# Allegro board BeagleV-FIRE_REV-A_230911.brd
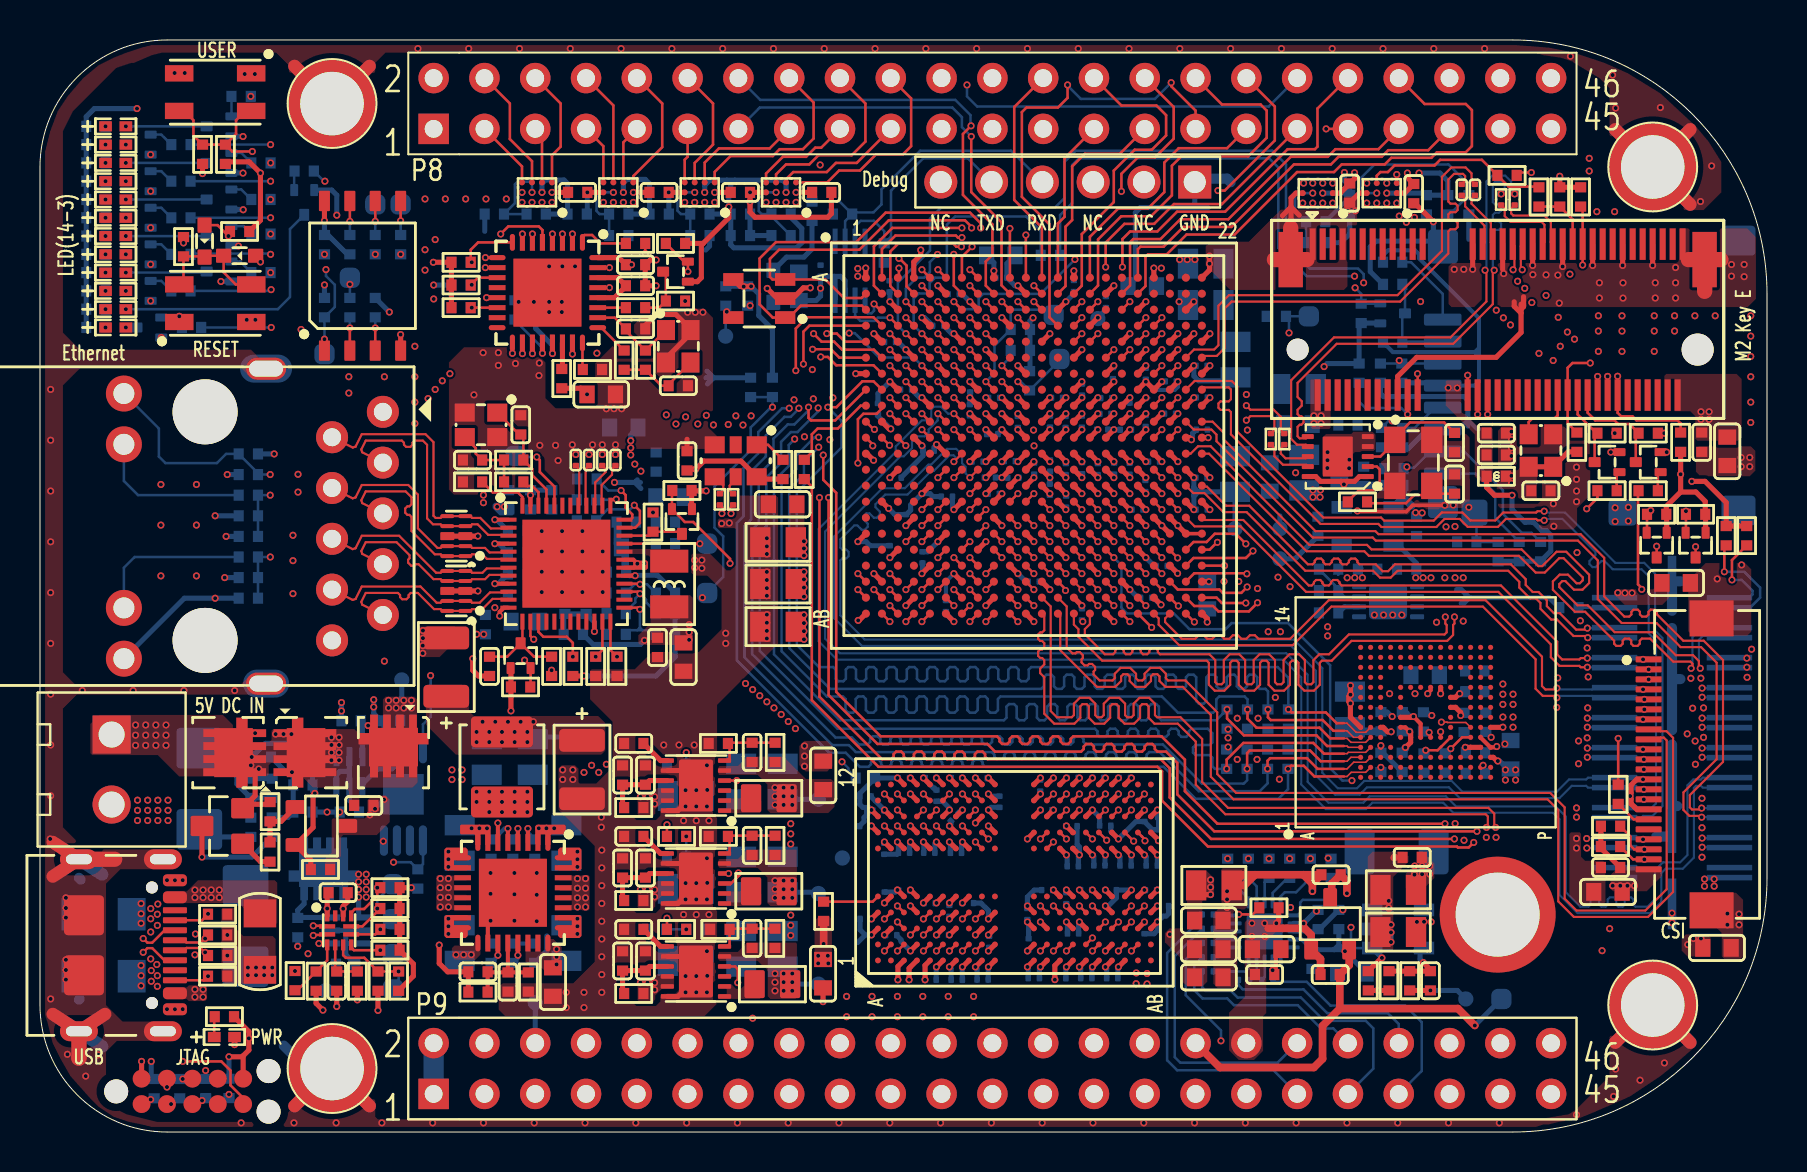
[diagram p0: board, top side]
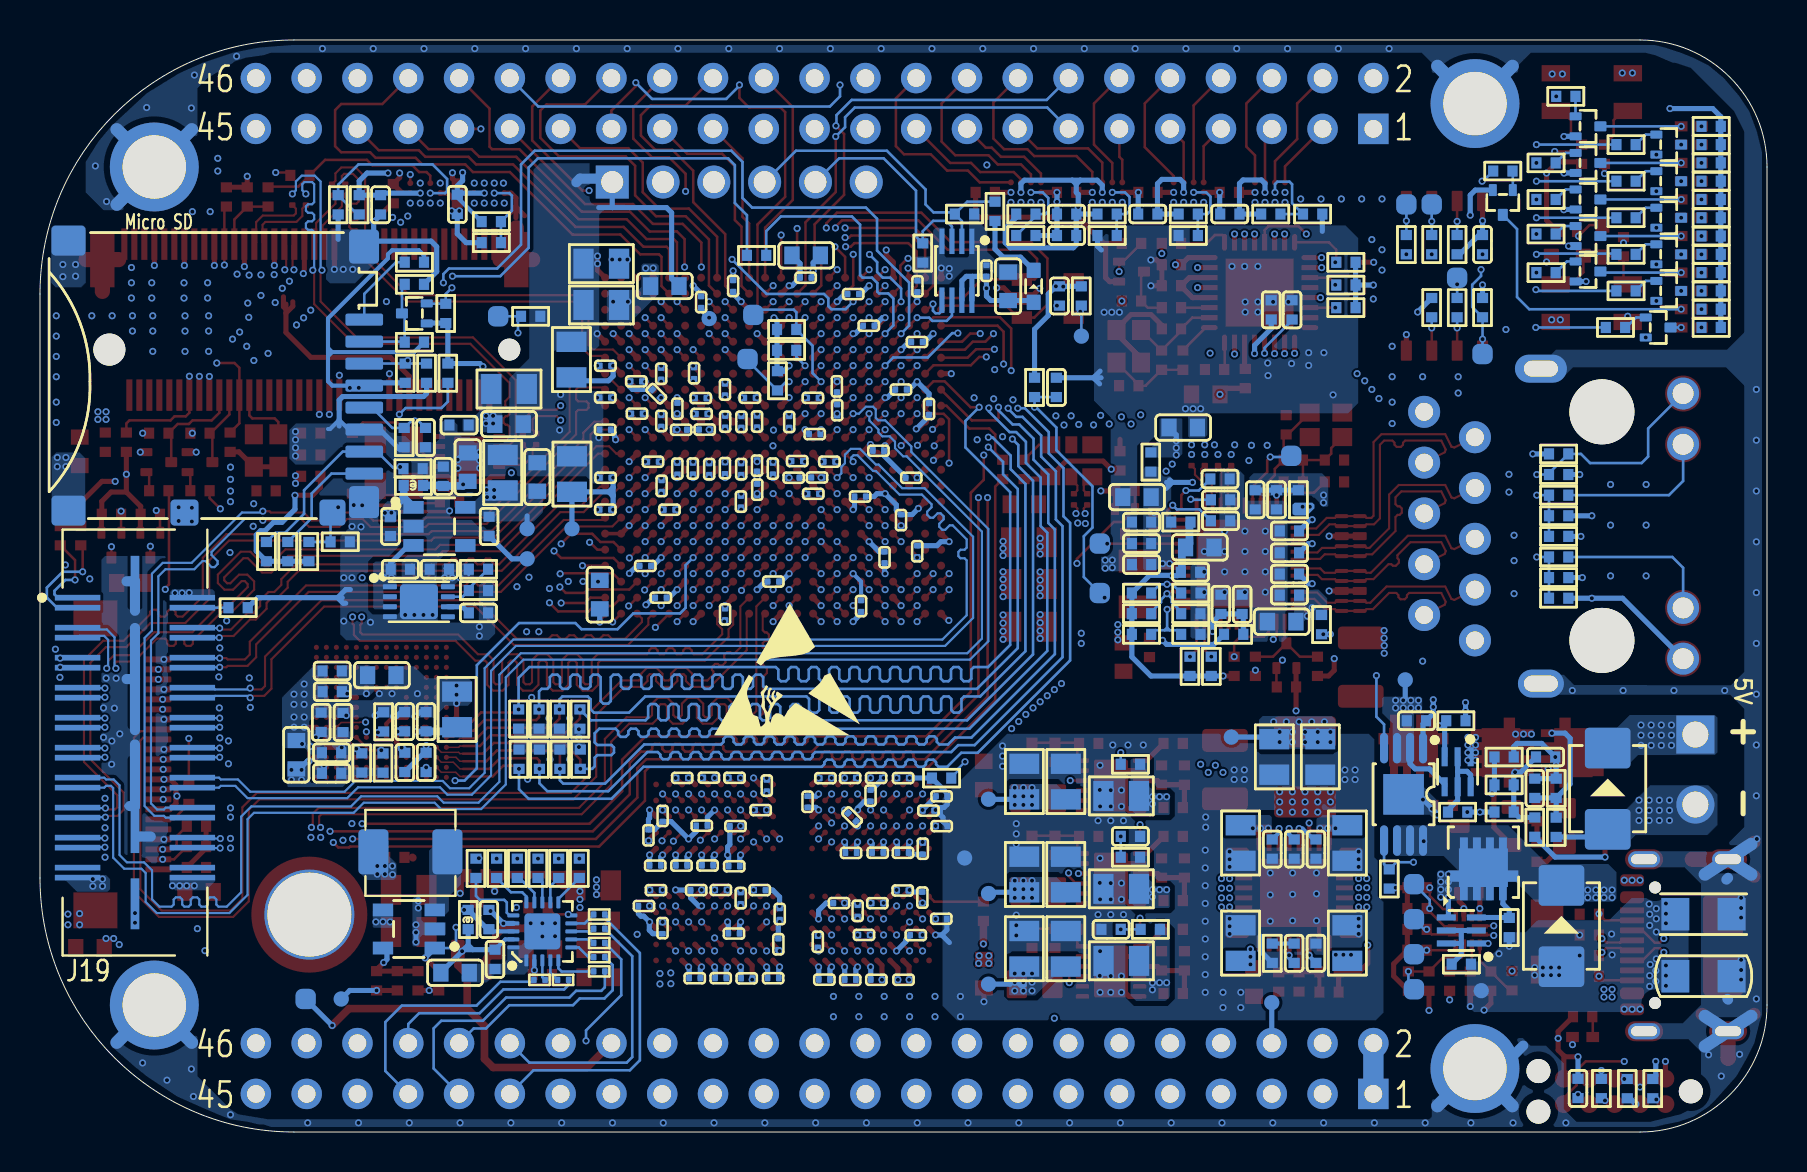
[diagram p1: board, bottom side, seen from below]

Outline 86.36 x 54.61 mm; copper layers: TOP, L2_GND1, L3_SIG1, L4_GND2, L5_SIG2, L6_GND3, L7_PWR1, L8_PWR2, L9_GND4, L10_SIG3, L11_GND5, BOTTOM. Coordinates in mm from the lower left corner of the outline.
Outline path: 0,48.26 0,6.35 arc(1.86,1.86) 6.35,0 73.66,0 arc(82.64,3.72) 86.36,12.7 86.36,41.91 arc(82.64,50.89) 73.66,54.61 6.35,54.61 arc(1.86,52.75) 0,48.26

## Design rules (mm)
constraint set DEFAULT: min track width 0.127
net group ADC_CSN: nets ADC_CSN N8479704
net group ADC_IRON: nets ADC_IRON N8479940
net group ADC_MCLK: nets ADC_MCLK N8479976
net group ADC_SCK_1: nets ADC_SCK_1 N8479744
net group AGND: nets ADC_VREF VDD_ADC
net group B0_HSIO70: nets B0_HSIO70N B0_HSIO70P
net group B0_HSIO71: nets B0_HSIO71N B0_HSIO71P
net group B0_HSIO81: nets B0_HSIO81N B0_HSIO81P
net group B0_HSIO82: nets B0_HSIO82N B0_HSIO82P
net group B0_HSIO83: nets B0_HSIO83N B0_HSIO83P
net group DIFFPAIR2: nets PHY_TDA_N PHY_TDA_P
net group DIFFPAIR3: nets PHY_TDB_N PHY_TDB_P
net group DIFFPAIR4: nets PHY_TDC_N PHY_TDC_P
net group DIFFPAIR5: nets PHY_TDD_N PHY_TDD_P
net group DP1: nets B0_HSIO73N_C2P_CLKN B0_HSIO73P_C2P_CLKP
net group EMMC_CLK: nets EMMC_CLK N10515706
net group H_M2_CLKREQ0N: nets H_M2_CLKREQ0N N8483531
net group JTAT_TDO: nets JTAT_TDO N8350787
net group M2_PER0_P: nets M2_PER0_N M2_PER0_P
net group M2_PET0_N: nets M2_PET0_N N8484033
net group M2_PET0_P: nets M2_PET0_P N8484079
net group M2_REFCLK_N: nets M2_REFCLK_N N8483949
net group M2_REFCLK_P: nets M2_REFCLK_P N8483961
net group M2_W_DISABLE1: nets M2_W_DISABLE1 N8759844
net group M2_W_DISABLE2: nets M2_W_DISABLE2 N8759792
net group MSS_REFCLK_IN_N: nets MSS_REFCLK_IN_N N8366838
net group MSS_REFCLK_IN_P: nets MSS_REFCLK_IN_P N8366836
net group MSS_SGMII_RX0_N: nets MSS_SGMII_RX0_N PHY_SGMII_SON
net group MSS_SGMII_RX0_P: nets MSS_SGMII_RX0_P PHY_SGMII_SOP
net group MSS_SGMII_TX0_N: nets MSS_SGMII_TX0_N PHY_SGMII_SIN
net group MSS_SGMII_TX0_P: nets MSS_SGMII_TX0_P PHY_SGMII_SIP
net group N8655619: nets N8655619 N8656945
net group N10796077: nets N10796077 N10797068
net group P8_PIN3: nets N8547620 P8_PIN3
net group P8_PIN4: nets N8547432 P8_PIN4
net group P8_PIN5: nets N8547443 P8_PIN5
net group P8_PIN6: nets N8547450 P8_PIN6
net group P8_PIN7: nets N8547457 P8_PIN7
net group P8_PIN8: nets N8547464 P8_PIN8
net group P8_PIN9: nets N8547471 P8_PIN9
net group P8_PIN10: nets N8547478 P8_PIN10
net group P8_PIN11: nets N8547485 P8_PIN11
net group P8_PIN12: nets N8547496 P8_PIN12
net group P8_PIN13: nets N8547505 P8_PIN13
net group P8_PIN14: nets N8547512 P8_PIN14
net group PWDN: nets CSI1_PWDN PWDN
net group SGMII_RX1: nets MSS_SGMII_RX1_N MSS_SGMII_RX1_P
net group SGMII_TX1: nets MSS_SGMII_TX1_N MSS_SGMII_TX1_P
net group SPI_MISO: nets N8350930 SPI_MISO
net group SPI_MOSI: nets N8350881 SPI_MOSI
net group SPI_SCK: nets N8350883 SPI_SCK
net group USB0_CLK: nets N8382887 USB0_CLK
net group USB0_DP: nets USB0_DM USB0_DP
net group USB0_VBUS: nets N8393015 USB0_VBUS
net group XCVR_0A_REFCLK_N: nets N8485397 XCVR_0A_REFCLK_N
net group XCVR_0A_REFCLK_P: nets N8485437 XCVR_0A_REFCLK_P
net group XCVR_0B_REFCLK_P: nets XCVR_0B_REFCLK_N XCVR_0B_REFCLK_P
net group XCVR_0C_REFCLK: nets XCVR_0C_REFCLK_N XCVR_0C_REFCLK_P
net group XCVR_RX1: nets XCVR_RX1_N XCVR_RX1_P
net group XCVR_TX1: nets XCVR_TX1_N XCVR_TX1_P
net group ADC_MISO: nets 3V3_SD_CS ADC_MISO ADC_MOSI N8479810 N8479866 SD_3V3 SD_DET
net group AVDD10: nets AVDD10 DVDD10 PHY_VDDIO
net group CAM: nets CAM_C_N CAM_C_P CAM_D0_N CAM_D0_P CAM_D1_N CAM_D1_P CAM_D2_N CAM_D2_P CAM_D3_N CAM_D3_P
net group EMMC: nets EMMC_CMD EMMC_DATA0 EMMC_DATA1 EMMC_DATA2 EMMC_DATA3 EMMC_DATA4 EMMC_DATA5 EMMC_DATA6 EMMC_DATA7 EMMC_DQ EMMC_RSTN
net group LPDDR4_CLASS: nets LPDDR4_CA0 LPDDR4_CA1 LPDDR4_CA2 LPDDR4_CA3 LPDDR4_CA4 LPDDR4_CA5 LPDDR4_CKE0_A LPDDR4_CS0_A LPDDR4_ODT_CA_A LPDDR4_RESETN
net group LPDDR4_CLK: nets LPDDR4_CK_N LPDDR4_CK_P LPDDR4_DQS3_N LPDDR4_DQS3_P
net group PCIE_RX: nets XCVR_RX2_N XCVR_RX2_P XCVR_RX3_N XCVR_RX3_P
net group PCIE_TX: nets XCVR_TX2_N XCVR_TX2_P XCVR_TX3_N XCVR_TX3_P
net group PG_1V0: nets N8667397 N8671822 PG_1V0
net group PHY_DVDD3V3: nets PHY_DVDD_RG
net group PHY_OUT: nets N8364939 PHY_OUT PHY_XI
net group POWER: nets VCC_1V8 VCC_2V5 VCC_3V3
net group USB0: nets USB0_DATA0 USB0_DATA1 USB0_DATA2 USB0_DATA3 USB0_DATA4 USB0_DATA5 USB0_DATA6 USB0_DATA7
net group USB0_XI: nets N8383947 USB0_XI USB0_XO

## Placement (name value [footprint] x y rotation side)
1  VShort  [VIRTUAL_SHORT]  62.25 10.19 180 top
C1  4.7uF  [C0805]  32.29 12.16 0 bottom
C2  100nF  [C0201]  45.75 15.75 45 bottom
C3  100nF  [C0201]  51.32 11.7 90 bottom
C4  100nF  [C0201]  52.32 7.69 0 bottom
C5  100nF  [C0201]  45.47 11.06 90 bottom
C6  100nF  [C0201]  52.91 17.72 0 bottom
C7  100nF  [C0201]  51.58 15.3 0 bottom
C8  100nF  [C0201]  44.54 7.61 180 bottom
C9  100nF  [C0201]  44.55 17.7 180 bottom
C10  100nF  [C0201]  50.02 17.33 270 bottom
C11  100nF  [C0201]  50.32 16.1 0 bottom
C12  100nF  [C0201]  49.7 7.69 0 bottom
C13  100nF  [C0201]  47.09 17.69 180 bottom
C14  100nF  [C0201]  44.47 13.96 180 bottom
C15  100nF  [C0201]  41.93 16.07 180 bottom
C16  100nF  [C0201]  49.44 9.39 270 bottom
C17  100nF  [C0201]  50.37 12.1 180 bottom
C18  100nF  [C0201]  56.16 11.3 0 bottom
C19  100nF  [C0201]  52.98 13.33 0 bottom
C20  100nF  [C0201]  51.63 17.71 0 bottom
C21  100nF  [C0201]  47.14 7.62 180 bottom
C22  100nF  [C0201]  55.93 14.84 90 bottom
C23  100nF  [C0201]  52.31 12.1 0 bottom
C24  100nF  [C0201]  51.65 13.29 0 bottom
C25  100nF  [C0201]  51.02 7.68 0 bottom
C26  100nF  [C0201]  44.83 16.82 90 bottom
C27  33pF  [C0402]  35.61 14.34 90 top
C28  100nF  [C0201]  45.8 13.96 180 bottom
C29  100nF  [C0201]  49.37 10.9 90 bottom
C30  100nF  [C0201]  47.46 9.51 270 bottom
C31  100nF  [C0201]  47.98 16.52 90 bottom
C32  100nF  [C0201]  45.84 7.61 180 bottom
C33  100nF  [C0201]  46.41 11.45 0 bottom
C34  100nF  [C0201]  44.49 11.44 180 bottom
C35  100nF  [C0201]  45.15 9.86 0 bottom
C36  100nF  [C0201]  43.21 13.96 180 bottom
C37  100nF  [C0201]  43.18 7.61 180 bottom
C38  100nF  [C0201]  53.62 7.69 0 bottom
C39  100nF  [C0201]  43.22 12.08 180 bottom
C40  100nF  [C0201]  43.2 17.7 180 bottom
C41  100nF  [C0201]  55.6 13.32 0 bottom
C42  100nF  [C0201]  55.56 12.1 0 bottom
C43  100nF  [C0201]  53.55 12.1 0 bottom
C44  100nF  [C0201]  42.57 9.85 0 bottom
C45  100nF  [C0201]  45.85 17.7 180 bottom
C46  100nF  [C0201]  53.27 15.32 0 bottom
C48  100nF  [C0201]  51.66 9.93 180 bottom
C49  100nF  [C0201]  41.28 16.79 180 bottom
C50  100nF  [C0201]  55.22 15.81 270 bottom
C51  100nF  [C0201]  54.28 13.32 0 bottom
C52  100nF  [C0201]  54.25 17.71 0 bottom
C53  100nF  [C0201]  55.23 10.2 270 bottom
C54  100nF  [C0201]  42.24 11.72 90 bottom
C55  100nF  [C0201]  41.29 10.66 180 bottom
C56  100nF  [C0201]  42.21 14.17 270 bottom
C57  100nF  [C0201]  41.27 15.3 180 bottom
C58  10uF  [C0603]  58.45 10.58 0 top
C59  10uF  [C0603]  39.16 7.92 270 top
C60  10uF  [C0603]  39.16 17.83 90 top
C61  10uF  [C0603]  58.45 9.14 0 top
C62  10uF  [C0603]  58.45 7.74 0 top
C63  100nF  [C0402]  68.13 20.52 90 bottom
C64  100nF  [C0402]  71.75 22.02 0 bottom
C65  100nF  [C0402]  71.75 23.06 0 bottom
C66  100nF  [C0402]  68.12 18.48 270 bottom
C67  100nF  [C0402]  67.06 20.52 90 bottom
C68  100nF  [C0402]  71.78 18.97 0 bottom
C69  100nF  [C0402]  72.3 20.49 90 bottom
C70  100nF  [C0402]  71.78 17.94 0 bottom
C71  100nF  [C0402]  71.21 20.48 90 bottom
C72  4.7uF  [C0603]  69.27 22.85 180 bottom
C73  4.7uF  [C0603]  73.54 18.87 90 bottom
C74  100nF  [C0402]  67.05 18.48 90 bottom
C75  100nF  [C0402]  72.82 34.95 0 top
C77  1uF  [C0402]  72.82 33.86 0 top
C81  100nF  [C0402]  9.45 2.18 270 bottom
C82  100nF  [C0402]  14.23 44.38 270 bottom
C83  1nF  [C1206]  3.18 7.79 180 bottom
C85  100nF  [C0201]  28.78 33.6 270 top
C86  100nF  [C0201]  28.12 33.6 270 top
C87  100nF  [C0201]  27.45 33.6 270 top
C88  100nF  [C0201]  26.79 33.6 270 top
C90  100nF  [C0402]  31.28 29.43 0 bottom
C91  1nF  [C0402]  31.28 30.5 0 bottom
C92  1uF  [C0402]  27.31 26.39 90 bottom
C93  100nF  [C0402]  26.25 26.39 90 bottom
C95  27pF  [C0402]  24.04 35.36 90 top
C96  27pF  [C0402]  21.63 33.6 180 top
C98  100nF  [C0402]  32.36 33.57 90 top
C99  1uF  [C0402]  24.53 31.62 270 bottom
C104  18pF  [C0402]  29.78 40.17 0 top
C105  18pF  [C0402]  31.92 37.32 0 top
C106  100nF  [C0402]  14.84 7.55 270 top
C107  100nF  [C0402]  14.91 11.97 0 top
C108  100uF  [C1206]  11 9.52 270 top
C109  100nF  [C0402]  17.53 20.57 180 bottom
C110  1uF  [C0402]  29.78 42.32 0 top
C111  1uF  [C0402]  23.75 41.11 90 bottom
C112  100nF  [C0402]  29.78 43.37 0 top
C113  22uF  [C0805]  37.14 12.88 90 bottom
C114  100nF  [C0402]  24.79 41.11 90 bottom
C115  2.2uF  [C0603]  28.07 36.89 0 top
C116  22uF  [C0805]  26.32 14.45 270 bottom
C117  100nF  [C0402]  61.24 7.88 180 top
C119  10uF  [C0603]  61.34 9.14 180 top
C120  100nF  [C0402]  64.56 12.87 180 top
C121  100nF  [C0402]  64.52 7.88 180 top
C127  100nF  [C0402]  63.91 10.62 90 bottom
C128  100nF  [C0402]  83.1 34.5 270 top
C129  10uF  [C0603]  84.37 34.04 270 top
C132  100nF  [C0201]  71.75 47.12 90 top
C133  100nF  [C0201]  71.09 47.12 90 top
C134  100nF  [C0402]  65.41 35.35 0 bottom
C135  10uF  [C0603]  62.91 35.4 180 bottom
C136  100nF  [C0402]  75.05 32.07 0 top
C138  100nF  [C0402]  63.61 8.64 270 bottom
C139  10uF  [C0603]  65.6 7.97 180 bottom
C140  2.2nF  [C0201]  58.08 38.32 0 bottom
C141  2.2nF  [C0201]  56.51 35.92 0 bottom
C142  10nF  [C0201]  58.1 35.12 0 bottom
C143  10nF  [C0201]  58.09 31.13 0 bottom
C144  100nF  [C0201]  58.08 32.72 0 bottom
C145  100nF  [C0201]  58.09 36.73 0 bottom
C146  47uF  [C0805]  59.76 32.9 90 bottom
C147  47uF  [C0805]  59.78 38.63 90 bottom
C148  47nF  [C0201]  50.51 33.32 270 bottom
C149  47nF  [C0201]  50.5 35.53 270 bottom
C150  47nF  [C0201]  53.32 36.7 0 bottom
C151  100nF  [C0201]  52.1 35.52 270 bottom
C152  100nF  [C0201]  48.89 35.51 90 bottom
C153  100nF  [C0201]  51.29 35.51 90 bottom
C154  1uF  [C0201]  53.71 33.18 270 bottom
C155  1uF  [C0201]  52.9 33.15 90 bottom
C156  1uF  [C0201]  53.28 35.91 180 bottom
C157  47uF  [C0805]  58.29 43.42 0 bottom
C158  330uF  [AVX_B]  27.1 18.13 270 top
C159  330uF  [AVX_B]  20.31 23.25 90 top
C160  10nF  [C0201]  51.3 33.15 90 bottom
C161  10nF  [C0201]  54.49 33.17 90 bottom
C162  10nF  [C0201]  49.71 33.17 270 bottom
C163  10nF  [C0201]  54.3 35.12 180 bottom
C164  10nF  [C0201]  52.11 33.2 270 bottom
C165  4.7nF  [C0201]  48.67 32.72 180 bottom
C166  10nF  [C0201]  50.5 32.12 90 bottom
C167  100nF  [C0201]  51.31 31.52 90 bottom
C168  47uF  [C0805]  58.7 12.33 0 top
C169  47uF  [C0805]  65.5 21.13 90 bottom
C170  1nF  [C0201]  55.71 33.52 0 bottom
C171  100nF  [C0201]  55.54 36.92 45 bottom
C172  47uF  [C0805]  63.22 32.97 90 bottom
C173  1nF  [C0201]  53.12 35.13 0 bottom
C174  10nF  [C0201]  47.69 31.92 180 bottom
C175  10nF  [C0201]  54.88 31.12 0 bottom
C176  100nF  [C0201]  46.51 37.29 270 bottom
C177  100nF  [C0201]  54.49 36.17 270 bottom
C178  47uF  [C0805]  36.91 29.49 180 top
C179  1nF  [C0201]  46.5 36.1 90 bottom
C180  100nF  [C0201]  50.86 36.72 180 bottom
C181  4.7nF  [C0201]  52.11 37.13 270 bottom
C182  10nF  [C0201]  53.65 37.95 90 bottom
C183  47uF  [C0805]  62.91 37.16 180 bottom
C184  100nF  [C0201]  47.62 34.9 0 bottom
C185  10uF  [C0603]  29.19 35.23 180 bottom
C186  1nF  [C0201]  48.49 33.55 0 bottom
C187  100nF  [C0201]  47.5 32.73 0 bottom
C188  10uF  [C0603]  37.13 31.39 180 top
C189  100nF  [C0402]  78.54 13.23 180 top
C190  22uF  [C0805]  20.99 14.45 270 bottom
C191  22uF  [C0805]  20.99 9.45 90 bottom
C192  22uF  [C0805]  26.32 9.45 90 bottom
C193  10uF  [C0603]  25.65 7.5 270 top
C194  47uF  [C0805]  24.64 18.76 270 bottom
C195  47uF  [C0805]  22.34 18.76 270 bottom
C196  1uF  [C0402]  68.83 30.29 270 bottom
C197  1uF  [C0402]  63.9 30.29 270 bottom
C198  1uF  [C0402]  68.34 28.14 180 bottom
C199  1uF  [C0402]  66.39 28.14 0 bottom
C200  22uF  [C0805]  35.06 12.88 90 bottom
C201  100nF  [C0402]  30.27 13.2 90 top
C202  1uF  [C0402]  29.13 13.2 90 top
C203  4.7uF  [C0805]  32.29 8.56 0 bottom
C204  22uF  [C0805]  37.14 9.16 90 bottom
C205  22uF  [C0805]  35.06 9.16 90 bottom
C206  100nF  [C0201]  39.03 43.07 90 bottom
C207  100pF  [C0402]  22.56 8.94 90 bottom
C208  100pF  [C0402]  23.4 7.5 270 top
C209  10nF  [C0402]  21.9 8.01 0 top
C210  33pF  [C0402]  23.65 8.94 90 bottom
C211  470pF  [C0402]  22.56 14.15 270 bottom
C212  1nF  [C0402]  24.74 14.15 270 bottom
C213  1nF  [C0402]  23.64 14.15 270 bottom
C214  33pF  [C0402]  35.61 9.69 90 top
C215  1uF  [C0402]  29.13 8.55 90 top
C216  100nF  [C0402]  30.27 8.55 90 top
C217  2.2nF  [C0402]  29.69 10.13 180 top
C218  2.2nF  [C0402]  29.69 14.78 180 top
C219  4.7uF  [C0805]  32.29 16.81 0 bottom
C220  33pF  [C0402]  35.61 18.98 90 top
C221  22uF  [C0805]  37.14 17.53 90 bottom
C222  22uF  [C0805]  35.06 17.53 90 bottom
C223  100nF  [C0402]  30.27 17.85 90 top
C224  1uF  [C0402]  29.13 17.85 90 top
C225  2.2nF  [C0402]  29.69 19.43 180 top
C226  100pF  [C0402]  35.53 37.24 90 bottom
C227  4.7nF  [C0201]  52.1 25.89 90 bottom
C228  100nF  [C0201]  56.09 28.31 0 bottom
C229  100nF  [C0201]  49.69 27.53 180 bottom
C230  47uF  [C0805]  36.91 25.27 180 top
C231  1nF  [C0201]  51.7 42.31 90 bottom
C232  1nF  [C0201]  55.31 26.72 180 bottom
C233  4.7nF  [C0201]  53.3 41.5 270 bottom
C234  100nF  [C0201]  48.07 42.72 0 bottom
C235  100nF  [C0201]  45.69 41.9 0 bottom
C236  47uF  [C0805]  58.29 41.36 0 bottom
C237  100nF  [C0201]  42.51 39.51 180 bottom
C238  10uF  [C0603]  55.12 42.3 180 bottom
C239  100nF  [C0201]  42.48 42.29 90 bottom
C240  100nF  [C0201]  44.92 40.32 180 bottom
C241  100nF  [C0201]  47.71 36.72 0 bottom
C242  10uF  [C0603]  48.05 43.84 0 bottom
C243  100nF  [C0201]  43.31 37.13 180 bottom
C244  100nF  [C0201]  41.9 36.16 90 bottom
C245  10uF  [C0603]  58.37 26.87 270 bottom
C246  100nF  [C0201]  44.43 34.07 180 bottom
C247  100nF  [C0201]  46.88 33.52 0 bottom
C248  10uF  [C0603]  37.95 42.29 90 bottom
C249  100nF  [C0201]  55.29 35.56 270 bottom
C250  100nF  [C0201]  55.28 32.31 90 bottom
C251  10uF  [C0603]  61.49 32.76 90 bottom
C252  100nF  [C0201]  56.54 37.54 0 bottom
C253  1nF  [C0201]  44.13 28.74 90 bottom
C254  3.3nF  [C0201]  42.79 32.72 0 bottom
C255  4.7nF  [C0201]  43.3 30.6 90 bottom
C256  10nF  [C0201]  45.35 31.78 180 bottom
C257  100nF  [C0201]  42.49 29.04 270 bottom
C258  100nF  [C0201]  45.3 26.3 90 bottom
C259  47uF  [C0805]  36.91 27.4 180 top
C260  100nF  [C0201]  55.3 37.92 90 bottom
C267  2.2nF  [C0402]  32.8 10.13 0 bottom
C268  2.2nF  [C0402]  31.83 14.78 180 bottom
C269  100nF  [C0402]  35.38 41.81 270 bottom
C270  1nF  [C0402]  64.44 25.96 180 bottom
C273  100nF  [C0402]  26.86 45.91 180 bottom
C274  100nF  [C0402]  26.89 46.99 0 top
C280  4.7uF  [C0603]  32.18 23.75 270 top
C281  100nF  [C0402]  30.88 24.23 270 top
C282  4.7uF  [C0603]  31.51 31.75 0 bottom
C283  100nF  [C0402]  23.88 27.9 0 bottom
C284  100nF  [C0402]  23.88 28.96 0 bottom
C285  100nF  [C0402]  25.59 31.62 270 bottom
C287  100nF  [C0402]  23.88 26.85 0 bottom
C288  100nF  [C0402]  23.88 30.06 0 bottom
C289  4.7uF  [C0603]  24.27 25.52 0 bottom
C290  100nF  [C0402]  31.28 28.38 0 bottom
C291  4.7uF  [C0603]  28.36 29.24 180 bottom
C292  100nF  [C0402]  28.83 27.99 180 bottom
C295  100pF  [C0402]  27.33 31.62 180 bottom
C296  100pF  [C0402]  27.35 32.66 180 bottom
C297  100pF  [C0402]  27.33 30.57 180 bottom
C298  100nF  [C0402]  22.48 23.29 270 top
C301  100nF  [C0402]  30.96 45.91 180 bottom
C302  100nF  [C0402]  30.96 46.99 0 top
C303  100nF  [C0402]  35.02 45.91 180 bottom
C304  100nF  [C0402]  35.02 46.99 0 top
C305  100nF  [C0402]  65.49 46.39 90 bottom
C306  100nF  [C0402]  65.49 46.95 270 top
C307  100nF  [C0402]  39.09 46.99 0 top
C308  100nF  [C0402]  35.02 44.83 180 bottom
C309  100nF  [C0402]  68.7 46.93 270 top
C310  100nF  [C0402]  69.33 46.37 90 bottom
C311  6.8pF  [C0402]  69.53 7.56 90 top
C312  4.7uF  [C0805]  67.92 10 180 top
C313  100nF  [C0402]  68.62 13.73 180 top
C314  22uF  [C0805]  67.92 12.11 180 top
C315  100nF  [C0402]  67.08 34.73 270 bottom
C318  10uF  [C0603]  83.86 9.21 0 top
C319  10uF  [C0603]  78.41 12.01 180 top
C320  10uF  [C0603]  81.82 27.46 0 top
C321  18pF  [C0402]  70.74 34.48 270 top
C322  18pF  [C0402]  70.74 32.41 90 top
C323  100nF  [C0402]  66.19 32.79 90 bottom
C324  4.7uF  [C0603]  64.97 33.25 90 bottom
C325  100nF  [C0402]  11.07 18.75 0 bottom
C327  100pF  [C0402]  16.19 16.33 0 top
C328  100pF  [C0402]  11.61 17.19 270 bottom
D1  TPD4E05U06DQAR  [USON10_0D5_2D5X1X0D5MM]  20.82 27.06 90 top
D2  TPD4E05U06DQAR  [USON10_0D5_2D5X1X0D5MM]  20.82 29.8 90 top
D3  ESDPSA0402V05  [D0402]  8.88 9.85 180 top
D4  ESDPSA0402V05  [D0402]  8.88 8.82 180 top
D5  ESDPSA0402V05  [D0402]  7.18 44.27 270 top
D6  ESDPSA0402V05  [D0402]  8.88 7.79 180 top
D7  ESDPSA0402V05  [D0402]  8.88 10.89 180 top
D8  SMBJ5.0CA-TR  [DO_214AA_SMB]  10.28 10.3 90 bottom
D9  ESDPSA0402V05  [D0402]  8.13 48.89 90 top
D10  ESDPSA0402V05  [D0402]  67.71 33.17 0 bottom
D11  ESDPSA0402V05  [D0402]  67.03 37.95 90 bottom
D12  ESDPSA0402V05  [D0402]  67.64 42.39 0 bottom
D13  ESDPSA0402V05  [D0402]  71.35 29.51 0 bottom
D14  ESDPSA0402V05  [D0402]  68.15 34.73 90 bottom
D15  LRB520S-30T1G  [SOD_523]  8.23 44.55 270 top
D16  LRB520S-30T1G  [SOD_523]  9.98 43.82 180 top
D17  LRB520S-30T1G  [SOD_523]  36.67 42.29 90 bottom
D18  ESDPSA0402V05  [D0402]  40.13 45.91 0 bottom
D19  ESDPSA0402V05  [D0402]  42.22 43.96 90 bottom
D25  SMBJ24CA  [DO_214AA_SMB]  7.97 17.17 90 bottom
FB2  600R  [L0402]  64.95 10.62 90 bottom
FB3  120R  [L0402]  72.82 32.79 180 top
FB4  120R  [L0402]  67.69 32.33 180 bottom
J1  STP128-350-2P  [TERMINAL_2P_3D5_STP128_7_4X7_7X8_5MM]  3.58 18.13 270 top
J2  YL004-030-001  [MICRO_SD_15X14_3X1_8MM]  70.15 31.83 90 bottom
J3  TC2050-IDC  [CONNECT10_1D27_12_4X6_7MM]  7.62 2.03 0 top
J4  LPJG0933H11NL  [RJ45_18P_21_23X15_93X13_3MM]  8.26 30.3 270 top
J5  TYPE-C 2.0  [USB2_0_TYPE_C]  6.7 9.34 0 top
J6  Header 1x6 2.54mm  [HEADER6P_2D54_DIP]  57.74 47.51 270 top
J7  FPC 22P 0.5mm  [FPC22_0D5_15_4X5_25X2MM_0D5_DX_NPWB]  80.74 18.39 90 top
J8  QSH-020-01-F-D-DP-A  [QSH40P_0D5_21D3X7D24MM]  84.48 26.72 270 bottom
J9  AS0BC27-S40BE-7H  [CON_MINIPEX_067_SMT_RA_M2_KEYE_C]  72.89 40.76 0 top
L1  0.56uH  [L4242]  23.1 18.26 90 top
L2  0.47uH  [L0805]  36.45 12.04 0 top
L3  0.47uH  [L0805]  36.45 16.69 0 top
L4  0.47uH  [L0805]  36.62 7.39 0 top
L5  2.2uH  [L1008]  31.47 27.4 270 top
L6  1uH  [L2P_4_2X4_4X1_8MM]  67.84 13.96 0 bottom
LED1  Green  [LED0402]  9.22 4.75 0 top
LED3  Blue  [LED0402]  3.78 50.29 0 top
LED4  Blue  [LED0402]  3.78 49.38 0 top
LED5  Blue  [LED0402]  3.78 48.46 0 top
LED6  Blue  [LED0402]  3.78 47.55 0 top
LED7  Blue  [LED0402]  3.78 46.63 0 top
LED8  Blue  [LED0402]  3.78 45.72 0 top
LED9  Blue  [LED0402]  3.78 44.81 0 top
LED10  Blue  [LED0402]  3.78 43.89 0 top
LED11  Blue  [LED0402]  3.78 42.98 0 top
LED12  Blue  [LED0402]  3.78 42.06 0 top
LED13  Blue  [LED0402]  3.78 41.15 0 top
LED14  Blue  [LED0402]  3.78 40.23 0 top
MH1  Hole 3MM  [MTGH200C125D_PL]  80.65 6.35 0 top
MH2  Hole 3MM  [MTGH200C125D_PL]  14.61 3.17 0 top
MH3  Hole 3MM  [MTGH200C125D_PL]  80.65 48.26 0 top
MH4  Nut M2  [PTH_4_2MM_5D8]  72.89 10.87 0 top
MH5  Hole 3MM  [MTGH200C125D_PL]  14.6 51.43 0 top
NOREF  -  []  0 48.26 0 top
NOREF#2  -  []  -235.81 -133.55 0 top
NOREF#3  -  []  6.35 0 90 top
NOREF#4  -  []  53.16 20.02 180 bottom
OSC1  32.768kHz  [X4-SMD-2_5X2_0X1_0MM]  75.05 34.08 90 top
P8  2.54mm 2x23 2.54mm  [HEADER23X2]  19.69 50.16 0 top
P9  2.54mm 2x23 2.54mm  [HEADER23X2]  19.69 1.9 0 top
Q1  RQ3E120ATTB  [DFN08_SON08_0D66_3X3MM]  17.68 18.97 270 top
Q2  BCM857BS-7-F  [SMINI6-F3-B]  15.29 10.08 270 bottom
Q3  DMG1012T-7  [SOT_523]  8.95 50.29 90 bottom
Q4  DMG1012T-7  [SOT_523]  4.91 49.38 90 bottom
Q5  DMG1012T-7  [SOT_523]  8.95 48.46 90 bottom
Q6  DMG1012T-7  [SOT_523]  78.36 33.5 270 top
Q7  DMG1012T-7  [SOT_523]  80.42 33.5 270 top
Q8  DMG1012T-7  [SOT_523]  4.91 47.55 90 bottom
Q9  DMG1012T-7  [SOT_523]  8.95 46.63 90 bottom
Q10  DMG1012T-7  [SOT_523]  4.91 45.72 90 bottom
Q11  DMG1012T-7  [SOT_523]  8.95 44.81 90 bottom
Q12  DMG1012T-7  [SOT_523]  4.91 43.89 90 bottom
Q13  DMG1012T-7  [SOT_523]  8.95 43.04 90 bottom
Q14  DMG1012T-7  [SOT_523]  4.91 42.06 90 bottom
Q15  DMG1012T-7  [SOT_523]  13.21 46.48 180 bottom
Q16  DMG1012T-7  [SOT_523]  5.44 40.23 90 bottom
Q17  RQ3E120ATTB  [DFN08_SON08_0D66_3X3MM]  14.18 13.49 90 bottom
Q18  BCM857BS-7-F  [SMINI6-F3-B]  15.47 18.02 180 bottom
Q19  DMG1012T-7  [SOT_523]  80.84 29.35 0 top
Q20  DMG1012T-7  [SOT_523]  82.79 29.35 0 top
Q24  DMG1012T-7  [SOT_523]  32.1 30.53 0 top
Q25  DMG1012T-7  [SOT_523]  24.03 23.82 180 top
Q27  DMG1012T-7  [SOT_523]  67.64 40.94 270 bottom
Q28  DMG1012T-7  [SOT_523]  31.78 43.02 270 top
Q29  RQ3E120ATTB  [DFN08_SON08_0D66_3X3MM]  13.58 18.97 0 top
Q30  MMBT3906LT  [SOT23]  9.12 15.3 90 top
Q31  RQ3E120ATTB  [DFN08_SON08_0D66_3X3MM]  9.4 18.97 180 top
R1  49.9K  [R0402]  15.29 8.39 180 bottom
R2  10K  [R0402]  41.28 17.7 0 bottom
R3  240R  [R0402]  39.18 11.04 270 top
R4  49.9K  [R0402]  62.43 20.65 90 bottom
R5  49.9K  [R0402]  60.38 20.65 90 bottom
R6  49.9K  [R0402]  59.34 18.64 270 bottom
R7  49.9K  [R0402]  61.39 18.64 270 bottom
R8  49.9K  [R0402]  62.41 18.64 270 bottom
R9  49.9K  [R0402]  61.4 20.65 90 bottom
R10  49.9K  [R0402]  59.36 20.65 90 bottom
R11  49.9K  [R0402]  60.36 18.64 270 bottom
R12  10K  [R0402]  69.21 18.45 90 bottom
R13  10K  [R0402]  70.27 18.46 90 bottom
R14  10K  [R0402]  69.18 20.51 90 bottom
R15  1K  [R0402]  9.22 5.77 180 top
R16  10K  [R0402]  5.71 2.17 90 bottom
R17  1K  [R0402]  6.99 2.17 270 bottom
R18  22R  [R0402]  8.28 2.17 90 bottom
R19  22R  [R0402]  18.04 44.38 90 bottom
R20  22R  [R0402]  16.77 44.38 90 bottom
R21  22R  [R0402]  15.5 41.23 90 bottom
R22  10K  [R0402]  49.02 39.09 180 bottom
R23  10K  [R0402]  49.02 40.13 180 bottom
R24  10K  [R0402]  49.48 37.57 270 bottom
R25  10K  [R0402]  16.77 41.23 270 bottom
R26  10K  [R0402]  15.5 44.38 90 bottom
R27  10K  [R0402]  14.23 41.23 270 bottom
R28  10K  [R0402]  36.63 37.24 270 bottom
R32  1M  [R1206]  3.18 10.89 180 bottom
R34  1M  [R0402]  23.69 33.6 180 top
R37  0R  [R0201]  34.66 31.64 90 top
R38  0R  [R0201]  34 31.64 90 top
R39  2.2k  [R0402]  37.15 33.13 90 top
R48  27R  [R0402]  29.78 44.44 180 top
R49  1K  [R0402]  26.09 37.68 270 top
R51  0R  [R0402]  29.21 38.6 270 top
R52  1M  [R0402]  30.28 38.6 270 top
R53  0R  [R0402]  15.87 7.55 270 top
R54  10K  [R0402]  17.5 12.22 180 top
R55  10K  [R0402]  18.89 12.65 90 bottom
R56  10K  [R0402]  12.75 7.57 270 top
R57  10K  [R0402]  17.93 7.55 90 top
R58  10K  [R0402]  17.5 9.09 180 top
R59  10K  [R0402]  17.5 10.13 180 top
R60  10K  [R0402]  13.81 7.55 270 top
R61  10K  [R0402]  16.9 7.55 270 top
R62  10K  [R0402]  17.5 11.18 180 top
R63  10K  [R0402]  34.29 41.81 270 bottom
R64  8.06K  [R0402]  27.63 38.13 0 top
R65  0R  [R0402]  21.06 41.22 0 bottom
R66  0R  [R0402]  21.06 41.22 180 top
R67  0R  [R0402]  21.06 42.36 0 bottom
R68  0R  [R0402]  21.06 42.36 180 top
R69  0R  [R0402]  21.06 43.49 0 bottom
R70  0R  [R0402]  21.06 43.49 180 top
R71  49.9K  [R0402]  12.89 10.22 270 bottom
R72  10R  [R0402]  59.39 13.19 270 bottom
R73  10R  [R0402]  60.42 13.19 270 bottom
R74  10R  [R0402]  61.46 13.19 270 bottom
R75  10R  [R0402]  62.49 13.19 270 bottom
R76  10R  [R0402]  63.53 13.19 270 bottom
R77  10R  [R0402]  64.56 13.19 270 bottom
R78  49.9K  [R0402]  77.04 46.76 270 top
R79  49.9K  [R0402]  76 46.76 270 top
R88  49.9K  [R0402]  65.96 37.95 270 bottom
R92  49.9K  [R0402]  76.85 34.5 90 top
R93  49.9K  [R0402]  82.04 34.5 90 top
R94  1K  [R0402]  78.36 32.07 0 top
R95  1K  [R0402]  80.42 32.07 0 top
R96  49.9K  [R0402]  78.36 34.95 180 top
R97  49.9K  [R0402]  80.42 34.95 180 top
R99  10K  [R0402]  9.98 45.03 180 top
R100  10K  [R0402]  30.84 10.13 0 bottom
R101  10K  [R0402]  31.83 13.74 0 bottom
R102  0R  [R0402]  31.83 14.78 0 top
R103  49.9K  [R0402]  82.79 30.89 180 top
R105  0R  [R0201]  61.55 34.65 90 top
R106  0R  [R0201]  62.22 34.65 90 top
R107  15K  [R0402]  64.44 28.14 180 bottom
R108  2.2k  [R0402]  78.54 14.27 0 top
R109  2.2k  [R0402]  78.54 15.29 0 top
R110  1K  [R0402]  2.79 50.29 0 bottom
R111  1K  [R0402]  2.79 49.38 0 bottom
R112  1K  [R0402]  2.79 48.46 0 bottom
R113  1K  [R0402]  2.79 47.55 0 bottom
R114  1K  [R0402]  2.79 46.63 0 bottom
R115  1K  [R0402]  2.79 45.72 0 bottom
R116  1K  [R0402]  2.79 44.81 0 bottom
R117  20K  [R0402]  24.74 8.94 270 bottom
R118  2.49K  [R0402]  24.42 7.5 270 top
R119  1.1K  [R0402]  21.9 6.99 0 top
R120  1K  [R0402]  2.79 43.89 0 bottom
R121  432K  [R0402]  36.75 9.69 90 top
R122  1K  [R0402]  2.79 42.98 0 bottom
R123  1K  [R0402]  2.79 42.06 0 bottom
R124  1K  [R0402]  2.79 41.15 0 bottom
R125  1K  [R0402]  2.79 40.23 0 bottom
R126  1K  [R0402]  10.06 51.79 180 bottom
R127  1K  [R0402]  7.58 40.23 180 bottom
R128  1K  [R0402]  7.05 49.38 180 bottom
R129  1K  [R0402]  11.05 48.46 180 bottom
R130  1K  [R0402]  7.05 47.55 180 bottom
R131  1K  [R0402]  11.05 46.63 180 bottom
R132  1K  [R0402]  7.05 45.72 180 bottom
R133  1K  [R0402]  11.05 44.91 180 bottom
R134  1K  [R0402]  7.05 43.89 180 bottom
R135  1K  [R0402]  11.05 42.98 180 bottom
R136  1K  [R0402]  7.05 42.06 180 bottom
R137  1K  [R0402]  13.21 48.06 180 bottom
R138  100K  [R0402]  34 10.13 180 top
R139  10K  [R0402]  9.27 48.89 90 top
R140  49.9K  [R0402]  15.47 16 180 bottom
R141  49.9K  [R0402]  15.56 20.57 180 bottom
R143  10R  [R0402]  29.69 6.93 180 top
R144  10R  [R0402]  29.69 11.58 180 top
R145  240K  [R0402]  36.76 14.34 90 top
R146  124K  [R0402]  33.92 14.78 180 top
R147  10R  [R0402]  29.69 16.22 180 top
R148  82K  [R0402]  36.76 18.98 90 top
R149  105K  [R0402]  33.92 19.43 180 top
R150  10K  [R0402]  31.83 18.39 0 bottom
R151  0R  [R0402]  31.83 10.13 0 top
R152  10K  [R0402]  61.82 40.79 180 bottom
R153  10K  [R0402]  64.44 27.08 180 bottom
R154  49.9K  [R0402]  80.84 30.89 180 top
R155  2.2k  [R0402]  14.03 13.13 0 top
R156  10K  [R0402]  24.81 45.91 180 bottom
R159  33R  [R0402]  50.53 43.84 0 bottom
R161  10K  [R0402]  72.91 29.02 90 bottom
R162  10K  [R0402]  68.1 37.95 90 bottom
R165  10K  [R0402]  73.97 29.02 90 bottom
R167  10K  [R0402]  67.64 43.5 0 bottom
R168  10K  [R0402]  75.04 29.02 90 bottom
R171  49.9K  [R0402]  76.45 26.22 180 bottom
R173  0R  [R0201]  73.74 46.63 90 top
R174  0R  [R0201]  73.07 46.63 90 top
R175  2.49K  [R0402]  21.63 32.51 180 top
R176  4.7K  [R0402]  10.42 26.69 0 bottom
R177  4.7K  [R0402]  28.81 25.92 180 bottom
R178  4.7K  [R0402]  28.81 26.95 180 bottom
R179  4.7K  [R0402]  10.42 27.72 180 bottom
R180  4.7K  [R0402]  31.28 26.95 180 bottom
R181  4.7K  [R0402]  31.28 25.92 180 bottom
R182  0R  [R0402]  23.69 32.51 180 top
R186  0R  [R0402]  29.31 30.5 0 bottom
R187  4.7K  [R0402]  31.28 24.89 180 bottom
R188  4.7K  [R0402]  28.85 23.29 270 top
R189  4.7K  [R0402]  27.79 23.29 90 bottom
R190  4.7K  [R0402]  28.81 24.89 180 bottom
R191  4.7K  [R0402]  28.85 23.29 90 bottom
R192  4.7K  [R0402]  27.79 23.29 270 top
R199  4.7K  [R0402]  10.42 33.91 180 bottom
R200  4.7K  [R0402]  10.42 30.82 0 bottom
R209  10K  [R0402]  67.64 39.5 0 bottom
R210  10K  [R0402]  66.07 40.94 90 bottom
R212  10K  [R0402]  31.78 41.56 180 top
R213  10K  [R0402]  31.78 44.44 180 top
R214  33R  [R0402]  29.78 41.22 180 top
R215  4.7K  [R0402]  30.65 30.5 270 top
R216  4.7K  [R0402]  25.58 23.29 90 top
R217  4.7K  [R0402]  32.1 32.08 180 top
R218  4.7K  [R0402]  24.03 22.26 0 top
R219  1.5K  [R0402]  26.64 23.29 90 top
R220  0R  [R0402]  30.81 33.5 270 bottom
R221  0R  [R0402]  26.67 24.89 180 bottom
R222  4.7K  [R0402]  10.42 32.88 180 bottom
R223  4.7K  [R0402]  10.42 29.79 180 bottom
R226  1M  [R0402]  13.15 17.36 180 bottom
R227  100K  [R0402]  11.5 14 270 top
R232  510R  [R0402]  10.42 28.75 180 bottom
R233  510R  [R0402]  10.42 31.85 180 bottom
R234  0R  [R0402]  23.43 31.62 270 bottom
R235  0R  [R0402]  22.28 25.37 270 bottom
R244  10K  [R0402]  28.94 45.91 180 bottom
R245  10K  [R0402]  33 45.91 180 bottom
R246  10K  [R0402]  63.79 45.53 0 bottom
R247  10K  [R0402]  37.06 45.91 0 bottom
R248  10K  [R0402]  70.4 46.37 90 bottom
R249  2.2k  [R0402]  84.32 29.82 270 top
R250  2.2k  [R0402]  85.34 29.82 270 top
R251  200K  [R0402]  68.49 7.56 90 top
R252  100K  [R0402]  67.46 7.56 270 top
R253  100K  [R0402]  66.42 7.56 270 top
R254  0R  [R0402]  38.22 33.13 270 top
R255  10K  [R0402]  38.61 46.04 90 bottom
R262  0R  [R0402]  74.96 46.76 90 top
R263  0R  [R0402]  73.36 47.84 0 top
R264  0R  [R0402]  65.88 31.51 180 top
R265  0R  [R0402]  78.92 16.89 90 top
R266  100R  [R0201]  61.38 7.61 0 bottom
R267  100R  [R0201]  60.2 7.61 180 bottom
R268  100R  [R0201]  58.39 8.03 180 bottom
R269  100R  [R0201]  58.39 8.74 180 bottom
R270  100R  [R0201]  58.39 9.45 180 bottom
R271  100R  [R0201]  58.39 10.17 180 bottom
R272  100R  [R0201]  58.39 10.88 180 bottom
R273  0R  [R0402]  61.46 11.21 0 top
R274  1M  [R0402]  22.72 45.91 180 bottom
R275  1M  [R0402]  28.94 44.83 0 bottom
R276  1M  [R0402]  37.06 44.83 180 bottom
R277  1M  [R0402]  71.45 46.37 270 bottom
R278  1M  [R0402]  33 44.83 0 bottom
R279  1M  [R0402]  63.79 44.48 0 bottom
R280  2.7K  [R0402]  13.15 18.75 0 bottom
R281  10K  [R0402]  11.5 16.02 270 top
R282  1K  [R0402]  11.61 15.25 90 bottom
R283  100K  [R0402]  13.15 16 0 bottom
R284  100K  [R0402]  10.54 17.19 270 bottom
R285  51K  [R0402]  10.54 15.24 270 bottom
SW1  Tactile Switch  [SW_4P]  8.77 41.45 0 top
SW2  Tactile Switch  [SW_4P]  8.76 52 180 top
TP1  Test Point  [TP40S_SMD]  50.98 38.66 180 bottom
TP2  Test Point  [TP40S_SMD]  50.69 40.86 180 bottom
TP3  Test Point  [TP40S_SMD]  18.04 46.39 180 bottom
TP4  Test Point  [TP40S_SMD]  15.5 42.72 270 bottom
TP5  Test Point  [TP40S_SMD]  14.23 38.9 0 bottom
TP6  Test Point  [TP40S_SMD]  16.77 46.39 180 bottom
TP7  Test Point  [TP40S_SMD]  33.36 26.95 180 bottom
TP9  Test Point  [TP40S_SMD]  23.79 33.82 180 bottom
TP10  Test Point  [TP40S_SMD]  17.65 7.14 180 bottom
TP11  Test Point  [TP40S_SMD]  17.65 8.89 180 bottom
TP12  Test Point  [TP40S_SMD]  17.65 10.64 180 bottom
TP13  Test Point  [TP40S_SMD]  17.65 12.39 180 bottom
TP14  Test Point  [TP40S_SMD]  63.45 40.79 180 bottom
TP15  Test Point  [TP30C_SMD]  34.29 39.8 180 bottom
TP16  Test Point  [TP40S_SMD]  33.36 29.43 180 bottom
TP17  Test Point  [TP30C_SMD]  18.09 22.61 180 bottom
TP18  Test Point  [TP30C_SMD]  71.3 6.65 180 bottom
TP19  Test Point  [TP30C_SMD]  38.93 7.39 180 bottom
TP20  Test Point  [TP30C_SMD]  38.93 11.93 180 bottom
TP21  Test Point  [TP30C_SMD]  59.76 30.17 180 bottom
TP22  Test Point  [TP30C_SMD]  62 30.17 180 bottom
TP23  Test Point  [TP30C_SMD]  26.79 19.75 180 bottom
TP24  Test Point  [TP30C_SMD]  38.93 16.64 180 bottom
TP25  Test Point  [TP30C_SMD]  62 28.66 180 bottom
TP26  Test Point  [TP30C_SMD]  14.29 7.07 180 bottom
TP27  Test Point  [TP30C_SMD]  40.12 13.7 180 bottom
TP29  Test Point  [TP30C_SMD]  52.9 40.68 180 bottom
TP30  Test Point  [TP40S_SMD]  73.08 6.65 180 bottom
TP31  Test Point  [TP30C_SMD]  24.77 6.47 90 bottom
U1  MPFS025T-FCVG484E  [M5S250_SOC_FCV484]  49.7 34.32 0 top
U2  16Gbit  [FBGA200_0D8_10X14_5X1MM]  48.73 12.98 90 top
U3  EMMC16G-TB29-PZ90  [BGA153_P14_P5_11P5X13]  69.29 20.99 90 top
U4  W25Q128FVSIG  [SOIC8_1D27_5_2X5_2X1_95MM]  16.13 42.82 0 top
U7  125MHz  [VDFN6_0D825_2_5X2X0_9MM]  34.79 33.57 270 top
U8  USB3340  [QFN32_0D5_5X5MM_EP3P3MM]  25.37 41.97 180 top
U9  PTN5150A  [X2QFN12_0D4_1_6X1_6X0_35MM]  14.96 10.08 0 top
U10  TPS2051BDGN  [DGN_16X60]  18.17 16.89 0 bottom
U11  MCP3464R  [QFN20_0D4_3X3X0_75MM]  61.24 10.03 90 bottom
U13  MIC22950YML-TR  [QFN32_0D5_5X5MM_EP3P3MM]  23.65 11.96 180 top
U14  MIC5504-2.5YM5-TR  [SOT23-5]  66.39 30.29 270 bottom
U16  MCP1754S 3.3V  [SOT_23_3]  64.52 10.41 0 top
U17  MCP1725T-ADJE/MC  [DFN8_0D5_2X3X0_9MM]  67.41 26.52 270 bottom
U18  MIC23303YML-TR  [DFN12_0D5_3X3X0_9MM]  32.8 12.68 180 top
U19  MIC23303YML-TR  [DFN12_0D5_3X3X0_9MM]  32.8 17.33 180 top
U20  MIC23303YML-TR  [DFN12_0D5_3X3X0_9MM]  32.8 8.03 180 top
U21  SN74LVC2G241DCUR  [U_8_DCU]  40.51 43.07 0 bottom
U22  FT24C32A-ELRT  [SOT23-5]  35.97 41.68 90 top
U28  RTL8211FS-CG  [QFN48_0D4_6X6_EP]  26.32 28.42 0 top
U30  UM3304  [BGA12_0D5_1_9X1_4X0_68MM]  24.85 46.99 180 top
U31  UM3304  [BGA12_0D5_1_9X1_4X0_68MM]  28.92 46.99 180 top
U32  UM3304  [BGA12_0D5_1_9X1_4X0_68MM]  32.99 46.99 180 top
U33  UM3304  [BGA12_0D5_1_9X1_4X0_68MM]  63.89 46.95 180 top
U34  UM3304  [BGA12_0D5_1_9X1_4X0_68MM]  37.06 46.99 180 top
U35  UM3304  [BGA12_0D5_1_9X1_4X0_68MM]  67.09 46.95 180 top
U36  TLV62569DBVT  [SOT23-5]  67.91 10.15 90 bottom
U38  Si52112-B3-GM2  [TDFN10_0D5_3X3X0_8MM]  64.9 33.78 90 top
U39  ATL431AIDBZR  [SOT_23_3]  14.07 15.3 270 top
X1  25MHz  [X4-SMD-2_5X2_0X1_0MM]  22.05 35.36 180 top
X2  27MHz  [X4-SMD-2_5X2_0X1_0MM]  31.92 39.29 270 top
X3  25MHz CL=12pF  [X4-SMD-3_2X2_5X1_0MM]  68.67 33.46 270 top

## Library data of the parts
1 = VIRTUAL_SHORT
C1 C203 C219 C312 = CC: signal model: DEFAULT_CAPACITOR_4.7e+06pF_1_2
C2-C26 C28-C46 C48-C57 C63-C71 C74 C75 C81 C82 C85-C88 C90 C93 C98 C106 C107 C109 C112 C114 C117 C120 C121 C127 C128 C132-C134 C136 C138 C144 C145 C151-C153 C167 C171 C176 C177 C180 C184 C187 C201 C206 C216 C223 C228 C229 C234 C235 C237 C239-C241 C243 C244 C246 C247 C249 C250 C252 C257 C258 C260 C281 C283-C285 C287 C288 C290 C292 C298 C313 C315 C323 = CC: signal model: DEFAULT_CAPACITOR_100000pF_1_2
C27 C210 C214 C220 = CC: signal model: DEFAULT_CAPACITOR_33.000000pF_1_2
C58-C62 C119 C129 C135 C139 C185 C188 C193 C238 C242 C245 C248 C251 C318-C320 = CC: signal model: DEFAULT_CAPACITOR_1e+07pF_1_2
C72 C73 C104 C105 C189 C269 C273 C274 C280 C282 C289 C291 C295-C297 C301-C311 C321 C322 C324 C325 C327 C328 = CC
C77 C92 C99 C110 C111 C154-C156 C196-C199 C202 C215 C224 = CC: signal model: DEFAULT_CAPACITOR_1e+06pF_1_2
C83 C91 C170 C173 C179 C186 C212 C213 C231 C232 C253 C270 = CC: signal model: DEFAULT_CAPACITOR_1000pF_1_2
C95 C96 = CC: signal model: DEFAULT_CAPACITOR_27.000000pF_1_2
C108 = CC: signal model: DEFAULT_CAPACITOR_1e+08pF_1_2
C113 C116 C190-C192 C200 C204 C205 C221 C222 C314 = CC: signal model: DEFAULT_CAPACITOR_2.2e+07pF_1_2
C115 = CC: signal model: DEFAULT_CAPACITOR_2.2e+06pF_1_2
C140 C141 C217 C218 C225 C267 C268 = CC: signal model: DEFAULT_CAPACITOR_2200pF_1_2
C142 C143 C160-C164 C166 C174 C175 C182 C209 C256 = CC: signal model: DEFAULT_CAPACITOR_10000pF_1_2
C146 C147 C157 C168 C169 C172 C178 C183 C194 C195 C230 C236 C259 = CC: signal model: DEFAULT_CAPACITOR_4.7e+07pF_1_2
C148-C150 = CC: signal model: DEFAULT_CAPACITOR_47000pF_1_2
C158 C159 = CT: signal model: DEFAULT_CAPACITOR_3.3e+08pF_1_2
C165 C181 C227 C233 C255 = CC: signal model: DEFAULT_CAPACITOR_4700pF_1_2
C207 C208 C226 = CC: signal model: DEFAULT_CAPACITOR_100.000000pF_1_2
C211 = CC: signal model: DEFAULT_CAPACITOR_470.000000pF_1_2
C254 = CC: signal model: DEFAULT_CAPACITOR_3300pF_1_2
D1 D2 = D_ESD_DIFFPAIR
D3-D14 D18 D19 D25 = DIODE TVS BI-DIR
D15-D17 = D
FB2 = FB: signal model: DEFAULT_RESISTOR_600.000000OHM_2_1
FB3 FB4 = FB: signal model: DEFAULT_RESISTOR_120.000000OHM_2_1
J1 = Header 1x2
J2 = MicroSD Card_10+4P
J3 = Header 2X5_1
J4 = RJ45_LPJG0933H11NL
J5 = USB2.0_Type C_16+6P#1
J6 = Header 1x6
J7 = FPC 22+2P
J8 = QSH-020-01-F-D-DP-A
J9 = PCIe_M.2_Key E_75Pin
L1 = L: signal model: DEFAULT_INDUCTOR_560.000000nH_1_2
L2-L4 = L: signal model: DEFAULT_INDUCTOR_470.000000nH_1_2
L5 L6 = L
LED1 LED3-LED14 = Single LED
MH1-MH5 = MHole
OSC1 = OSC_4P
P8 P9 = Header 2x23
Q1 Q17 Q29 Q31 = PMOS_5P
Q2 Q18 = PNPx2_126_453
Q3-Q16 Q19 Q20 Q24 Q25 Q27 Q28 = NMOS_123
Q30 = PNP
R1 R4-R11 R71 R78 R79 R88 R92 R93 R96 R97 R103 R140 R141 R154 R171 = R: signal model: DEFAULT_RESISTOR_49900OHM_1_2
R2 R12-R14 R16 R22-R28 R54-R62 R99-R101 R139 R150 R152 R156 R161 R162 R168 R209 R210 R212 R213 R244-R248 = R: signal model: DEFAULT_RESISTOR_10000OHM_1_2
R3 = R: signal model: DEFAULT_RESISTOR_240.000000OHM_1_2
R15 R17 R49 R94 R95 R110-R116 R120 R122-R137 = R: signal model: DEFAULT_RESISTOR_1000.000000OHM_1_2
R18-R21 = R: signal model: DEFAULT_RESISTOR_22.000000OHM_1_2
R32 R34 R37 R38 R51-R53 R65-R70 R102 R105 R106 R151 R173 R174 R182 R186 R220 R221 R234 R235 R254 R262 R264 R265 = R: signal model: DEFAULT_RESISTOR_0.001OHM_1_2
R39 R108 R109 R249 R250 = R: signal model: DEFAULT_RESISTOR_2200OHM_1_2
R48 = R: signal model: DEFAULT_RESISTOR_27.000000OHM_1_2
R63 R107 R153 R155 R159 R165 R167 R176-R181 R187-R192 R199 R200 R214-R219 R222 R223 R226 R227 R232 R233 R251 R255 R263 R266-R285 = R
R64 = R: signal model: DEFAULT_RESISTOR_8060OHM_1_2
R72-R77 R143 R144 R147 = R: signal model: DEFAULT_RESISTOR_10.000000OHM_1_2
R117 = R: signal model: DEFAULT_RESISTOR_20000OHM_1_2
R118 R175 = R: signal model: DEFAULT_RESISTOR_2490OHM_1_2
R119 = R: signal model: DEFAULT_RESISTOR_1100OHM_1_2
R121 = R: signal model: DEFAULT_RESISTOR_432000OHM_1_2
R138 R252 R253 = R: signal model: DEFAULT_RESISTOR_100000OHM_1_2
R145 = R: signal model: DEFAULT_RESISTOR_240000OHM_1_2
R146 = R: signal model: DEFAULT_RESISTOR_124000OHM_1_2
R148 = R: signal model: DEFAULT_RESISTOR_82000OHM_1_2
R149 = R: signal model: DEFAULT_RESISTOR_105000OHM_1_2
SW1 SW2 = Tactile Switch_4P
TP1-TP7 TP9-TP27 TP29-TP31 = Test Point
U1 = MPFS025T-FCVG484E
U2 = MT53D512M32D2DS: signal model: MT53B512M32D2DS
U3 = eMMC_1
U4 = QSPI_8P
U7 = DSC1123XXX
U8 = USB3340-EZK-TR
U9 = PTN5150A
U10 = TPS2051BDGN
U11 = MCP3564R
U13 = MIC22950YML
U14 = LDO_5P
U16 = LDO_3P
U17 = MCP1725T-ADJEMC
U18-U20 = MIC23303YML
U21 = SN74LVC2G241
U22 = MEM_24LC32_SOT23-5
U28 = RTL8211FS-CG
U30-U35 = UM3304
U36 = TLV62569DBVT
U38 = Si52112-B3
U39 = TLV431A_1
X1-X3 = XTAL_4P

## Footprints (pads in the part's own frame, mm; a bottom-side part is the same pattern mirrored in y, then rotated)
AVX_B
  rrect 1.143x2.286 smd: 1(-1.46,0) 2(1.46,0)
BGA12_0D5_1_9X1_4X0_68MM
  round 0.3 smd: A1(-0.75,0.5) A2(-0.75,0) A3(-0.75,-0.5) B1(-0.25,0.5) B2(-0.25,0) B3(-0.25,-0.5) C1(0.25,0.5) C2(0.25,0) C3(0.25,-0.5) D1(0.75,0.5) D2(0.75,0) D3(0.75,-0.5)
BGA153_P14_P5_11P5X13
  round 0.254 smd: A1(-3.25,3.25) A2(-2.75,3.25) A3(-2.25,3.25) A4(-1.75,3.25) A5(-1.25,3.25) A6(-0.75,3.25) A7(-0.25,3.25) A8(0.25,3.25) A9(0.75,3.25) A10(1.25,3.25) A11(1.75,3.25) A12(2.25,3.25) A13(2.75,3.25) A14(3.25,3.25) B1(-3.25,2.75) B2(-2.75,2.75) B3(-2.25,2.75) B4(-1.75,2.75) B5(-1.25,2.75) B6(-0.75,2.75) B7(-0.25,2.75) B8(0.25,2.75) B9(0.75,2.75) B10(1.25,2.75) B11(1.75,2.75) B12(2.25,2.75) B13(2.75,2.75) B14(3.25,2.75) C1(-3.25,2.25) C2(-2.75,2.25) C3(-2.25,2.25) C4(-1.75,2.25) C5(-1.25,2.25) C6(-0.75,2.25) C7(-0.25,2.25) C8(0.25,2.25) C9(0.75,2.25) C10(1.25,2.25) C11(1.75,2.25) C12(2.25,2.25) C13(2.75,2.25) C14(3.25,2.25) D1(-3.25,1.75) D2(-2.75,1.75) D3(-2.25,1.75) D4(-1.75,1.75) D12(2.25,1.75) D13(2.75,1.75) D14(3.25,1.75) E1(-3.25,1.25) E2(-2.75,1.25) E3(-2.25,1.25) E5(-1.25,1.25) E6(-0.75,1.25) E7(-0.25,1.25) E8(0.25,1.25) E9(0.75,1.25) E10(1.25,1.25) E12(2.25,1.25) E13(2.75,1.25) E14(3.25,1.25) F1(-3.25,0.75) F2(-2.75,0.75) F3(-2.25,0.75) F5(-1.25,0.75) F10(1.25,0.75) F12(2.25,0.75) F13(2.75,0.75) F14(3.25,0.75) G1(-3.25,0.25) G2(-2.75,0.25) G3(-2.25,0.25) G5(-1.25,0.25) G10(1.25,0.25) G12(2.25,0.25) G13(2.75,0.25) G14(3.25,0.25) H1(-3.25,-0.25) H2(-2.75,-0.25) H3(-2.25,-0.25) H5(-1.25,-0.25) H10(1.25,-0.25) H12(2.25,-0.25) H13(2.75,-0.25) H14(3.25,-0.25) J1(-3.25,-0.75) J2(-2.75,-0.75) J3(-2.25,-0.75) J5(-1.25,-0.75) J10(1.25,-0.75) J12(2.25,-0.75) J13(2.75,-0.75) J14(3.25,-0.75) K1(-3.25,-1.25) K2(-2.75,-1.25) K3(-2.25,-1.25) K5(-1.25,-1.25) K6(-0.75,-1.25) K7(-0.25,-1.25) K8(0.25,-1.25) K9(0.75,-1.25) K10(1.25,-1.25) K12(2.25,-1.25) K13(2.75,-1.25) K14(3.25,-1.25) L1(-3.25,-1.75) L2(-2.75,-1.75) L3(-2.25,-1.75) L12(2.25,-1.75) L13(2.75,-1.75) L14(3.25,-1.75) M1(-3.25,-2.25) M2(-2.75,-2.25) M3(-2.25,-2.25) M4(-1.75,-2.25) M5(-1.25,-2.25) M6(-0.75,-2.25) M7(-0.25,-2.25) M8(0.25,-2.25) M9(0.75,-2.25) M10(1.25,-2.25) M11(1.75,-2.25) M12(2.25,-2.25) M13(2.75,-2.25) M14(3.25,-2.25) N1(-3.25,-2.75) N2(-2.75,-2.75) N3(-2.25,-2.75) N4(-1.75,-2.75) N5(-1.25,-2.75) N6(-0.75,-2.75) N7(-0.25,-2.75) N8(0.25,-2.75) N9(0.75,-2.75) N10(1.25,-2.75) N11(1.75,-2.75) N12(2.25,-2.75) N13(2.75,-2.75) N14(3.25,-2.75) P1(-3.25,-3.25) P2(-2.75,-3.25) P3(-2.25,-3.25) P4(-1.75,-3.25) P5(-1.25,-3.25) P6(-0.75,-3.25) P7(-0.25,-3.25) P8(0.25,-3.25) P9(0.75,-3.25) P10(1.25,-3.25) P11(1.75,-3.25) P12(2.25,-3.25) P13(2.75,-3.25) P14(3.25,-3.25)
C0201
  rrect 0.279x0.318 smd: 1(-0.279,0) 2(0.279,0)
C0402
  rect 0.508x0.559 smd: 1(-0.483,0) 2(0.483,0)
C0603
  rect 0.762x0.889 smd: 1(-0.711,0) 2(0.711,0)
C0805
  rect 1.016x1.499 smd: 1(-0.889,0) 2(0.889,0)
C1206
  rect 1.397x1.626 smd: 1(-1.41,0) 2(1.41,0)
CON_MINIPEX_067_SMT_RA_M2_KEYE_C
  round 1.1 hole 1.1 unplated: (-10,-1.636)
  round 1.6 hole 1.6 unplated: (10,-1.636)
  rect 0.305x1.575 smd: 1(-9.25,3.639) 2(-9,-3.911) 3(-8.75,3.639) 4(-8.5,-3.911) 5(-8.25,3.639) 6(-8,-3.911) 7(-7.75,3.639) 8(-7.5,-3.911) 9(-7.25,3.639) 10(-7,-3.911) 11(-6.75,3.639) 12(-6.5,-3.911) 13(-6.25,3.639) 14(-6,-3.911) 15(-5.75,3.639) 16(-5.5,-3.911) 17(-5.25,3.639) 18(-5,-3.911) 19(-4.75,3.639) 20(-4.5,-3.911) 21(-4.25,3.639) 22(-4,-3.911) 23(-3.75,3.639) 32(-1.5,-3.911) 33(-1.25,3.639) 34(-1,-3.911) 35(-0.75,3.639) 36(-0.5,-3.911) 37(-0.25,3.639) 38(0,-3.911) 39(0.25,3.639) 40(0.5,-3.911) 41(0.75,3.639) 42(1,-3.911) 43(1.25,3.639) 44(1.5,-3.911) 45(1.75,3.639) 46(2,-3.911) 47(2.25,3.639) 48(2.5,-3.911) 49(2.75,3.639) 50(3,-3.911) 51(3.25,3.639) 52(3.5,-3.911) 53(3.75,3.639) 54(4,-3.911) 55(4.25,3.639) 56(4.5,-3.911) 57(4.75,3.639) 58(5,-3.911) 59(5.25,3.639) 60(5.5,-3.911) 61(5.75,3.639) 62(6,-3.911) 63(6.25,3.639) 64(6.5,-3.911) 65(6.75,3.639) 66(7,-3.911) 67(7.25,3.639) 68(7.5,-3.911) 69(7.75,3.639) 70(8,-3.911) 71(8.25,3.639) 72(8.5,-3.911) 73(8.75,3.639) 74(9,-3.911) 75(9.25,3.639)
  rect 1.219x2.769 smd: 76(-10.35,2.864) 77(10.35,2.864)
CONNECT10_1D27_12_4X6_7MM
  round 1.2 hole 1.2 unplated: (-3.81,0) (3.81,1.015) (3.81,-1.015)
  round 0.89 smd: 1(-2.54,-0.635) 2(-1.27,-0.635) 3(0,-0.635) 4(1.27,-0.635) 5(2.54,-0.635) 6(2.54,0.635) 7(1.27,0.635) 8(0,0.635) 9(-1.27,0.635) 10(-2.54,0.635)
D0402
  rect 0.508x0.559 smd: 1(-0.483,0) 2(0.483,0)
DFN8_0D5_2X3X0_9MM
  rrect 0.25x0.7 smd: 1(-0.75,-1.45) 2(-0.25,-1.45) 3(0.25,-1.45) 4(0.75,-1.45) 5(0.75,1.45) 6(0.25,1.45) 7(-0.25,1.45) 8(-0.75,1.45)
  rrect 1.75x1.9 smd: 9(0,0)
DFN08_SON08_0D66_3X3MM
  rect 1.1x0.39 smd: 1(-1.354,0.975) 2(-1.354,0.325) 3(-1.354,-0.325) 4(-1.354,-0.975)
  custom 2.479x3.5 smd: 5(0,0)
DFN12_0D5_3X3X0_9MM
  rrect 0.66x0.23 smd: 1(-1.43,1.25) 2(-1.43,0.75) 3(-1.43,0.25) 4(-1.43,-0.25) 5(-1.43,-0.75) 6(-1.43,-1.25) 7(1.43,-1.25) 8(1.43,-0.75) 9(1.43,-0.25) 10(1.43,0.25) 11(1.43,0.75) 12(1.43,1.25)
  rrect 1.7x2.6 smd: 13(0,0)
DGN_16X60
  oval 0.406x1.524 smd: 1(-0.975,-2.311) 2(-0.325,-2.311) 3(0.325,-2.311) 4(0.975,-2.311) 5(0.975,2.311) 6(0.325,2.311) 7(-0.325,2.311) 8(-0.975,2.311)
  rect 2.032x2.032 smd: 9(0,0)
DO_214AA_SMB
  rrect 2.032x2.286 smd: 1(-2.032,0) 2(2.032,0)
FBGA200_0D8_10X14_5X1MM
  round 0.29 smd: A1(-4.4,6.825) A2(-3.6,6.825) A3(-2.8,6.825) A4(-2,6.825) A5(-1.2,6.825) A8(1.2,6.825) A9(2,6.825) A10(2.8,6.825) A11(3.6,6.825) A12(4.4,6.825) AA1(-4.4,-6.175) AA2(-3.6,-6.175) AA3(-2.8,-6.175) AA4(-2,-6.175) AA5(-1.2,-6.175) AA8(1.2,-6.175) AA9(2,-6.175) AA10(2.8,-6.175) AA11(3.6,-6.175) AA12(4.4,-6.175) AB1(-4.4,-6.825) AB2(-3.6,-6.825) AB3(-2.8,-6.825) AB4(-2,-6.825) AB5(-1.2,-6.825) AB8(1.2,-6.825) AB9(2,-6.825) AB10(2.8,-6.825) AB11(3.6,-6.825) AB12(4.4,-6.825) B1(-4.4,6.175) B2(-3.6,6.175) B3(-2.8,6.175) B4(-2,6.175) B5(-1.2,6.175) B8(1.2,6.175) B9(2,6.175) B10(2.8,6.175) B11(3.6,6.175) B12(4.4,6.175) C1(-4.4,5.525) C2(-3.6,5.525) C3(-2.8,5.525) C4(-2,5.525) C5(-1.2,5.525) C8(1.2,5.525) C9(2,5.525) C10(2.8,5.525) C11(3.6,5.525) C12(4.4,5.525) D1(-4.4,4.875) D2(-3.6,4.875) D3(-2.8,4.875) D4(-2,4.875) D5(-1.2,4.875) D8(1.2,4.875) D9(2,4.875) D10(2.8,4.875) D11(3.6,4.875) D12(4.4,4.875) E1(-4.4,4.225) E2(-3.6,4.225) E3(-2.8,4.225) E4(-2,4.225) E5(-1.2,4.225) E8(1.2,4.225) E9(2,4.225) E10(2.8,4.225) E11(3.6,4.225) E12(4.4,4.225) F1(-4.4,3.575) F2(-3.6,3.575) F3(-2.8,3.575) F4(-2,3.575) F5(-1.2,3.575) F8(1.2,3.575) F9(2,3.575) F10(2.8,3.575) F11(3.6,3.575) F12(4.4,3.575) G1(-4.4,2.925) G2(-3.6,2.925) G3(-2.8,2.925) G4(-2,2.925) G5(-1.2,2.925) G8(1.2,2.925) G9(2,2.925) G10(2.8,2.925) G11(3.6,2.925) G12(4.4,2.925) H1(-4.4,2.275) H2(-3.6,2.275) H3(-2.8,2.275) H4(-2,2.275) H5(-1.2,2.275) H8(1.2,2.275) H9(2,2.275) H10(2.8,2.275) H11(3.6,2.275) H12(4.4,2.275) J1(-4.4,1.625) J2(-3.6,1.625) J3(-2.8,1.625) J4(-2,1.625) J5(-1.2,1.625) J8(1.2,1.625) J9(2,1.625) J10(2.8,1.625) J11(3.6,1.625) J12(4.4,1.625) K1(-4.4,0.975) K2(-3.6,0.975) K3(-2.8,0.975) K4(-2,0.975) K5(-1.2,0.975) K8(1.2,0.975) K9(2,0.975) K10(2.8,0.975) K11(3.6,0.975) K12(4.4,0.975) N1(-4.4,-0.975) N2(-3.6,-0.975) N3(-2.8,-0.975) N4(-2,-0.975) N5(-1.2,-0.975) N8(1.2,-0.975) N9(2,-0.975) N10(2.8,-0.975) N11(3.6,-0.975) N12(4.4,-0.975) P1(-4.4,-1.625) P2(-3.6,-1.625) P3(-2.8,-1.625) P4(-2,-1.625) P5(-1.2,-1.625) P8(1.2,-1.625) P9(2,-1.625) P10(2.8,-1.625) P11(3.6,-1.625) P12(4.4,-1.625) R1(-4.4,-2.275) R2(-3.6,-2.275) R3(-2.8,-2.275) R4(-2,-2.275) R5(-1.2,-2.275) R8(1.2,-2.275) R9(2,-2.275) R10(2.8,-2.275) R11(3.6,-2.275) R12(4.4,-2.275) T1(-4.4,-2.925) T2(-3.6,-2.925) T3(-2.8,-2.925) T4(-2,-2.925) T5(-1.2,-2.925) T8(1.2,-2.925) T9(2,-2.925) T10(2.8,-2.925) T11(3.6,-2.925) T12(4.4,-2.925) U1(-4.4,-3.575) U2(-3.6,-3.575) U3(-2.8,-3.575) U4(-2,-3.575) U5(-1.2,-3.575) U8(1.2,-3.575) U9(2,-3.575) U10(2.8,-3.575) U11(3.6,-3.575) U12(4.4,-3.575) V1(-4.4,-4.225) V2(-3.6,-4.225) V3(-2.8,-4.225) V4(-2,-4.225) V5(-1.2,-4.225) V8(1.2,-4.225) V9(2,-4.225) V10(2.8,-4.225) V11(3.6,-4.225) V12(4.4,-4.225) W1(-4.4,-4.875) W2(-3.6,-4.875) W3(-2.8,-4.875) W4(-2,-4.875) W5(-1.2,-4.875) W8(1.2,-4.875) W9(2,-4.875) W10(2.8,-4.875) W11(3.6,-4.875) W12(4.4,-4.875) Y1(-4.4,-5.525) Y2(-3.6,-5.525) Y3(-2.8,-5.525) Y4(-2,-5.525) Y5(-1.2,-5.525) Y8(1.2,-5.525) Y9(2,-5.525) Y10(2.8,-5.525) Y11(3.6,-5.525) Y12(4.4,-5.525)
FPC22_0D5_15_4X5_25X2MM_0D5_DX_NPWB
  rrect 0.3x1.3 smd: 1(5.25,0.3) 2(4.75,0.3) 3(4.25,0.3) 4(3.75,0.3) 5(3.25,0.3) 6(2.75,0.3) 7(2.25,0.3) 8(1.75,0.3) 9(1.25,0.3) 10(0.75,0.3) 11(0.25,0.3) 12(-0.25,0.3) 13(-0.75,0.3) 14(-1.25,0.3) 15(-1.75,0.3) 16(-2.25,0.3) 17(-2.75,0.3) 18(-3.25,0.3) 19(-3.75,0.3) 20(-4.25,0.3) 21(-4.75,0.3) 22(-5.25,0.3)
  rect 1.8x2.2 smd: 23(-7.3,-2.847) 24(7.3,-2.847)
HEADER6P_2D54_DIP
  rect 1.651x1.651 hole 1.1: 1(0,0)
  round 1.651 hole 1.1: 2(0,-2.54) 3(0,-5.08) 4(0,-7.62) 5(0,-10.16) 6(0,-12.7)
HEADER23X2
  rect 1.524x1.524 hole 0.889: 1(0,0)
  round 1.524 hole 0.889: 2(0,2.54) 3(2.54,0) 4(2.54,2.54) 5(5.08,0) 6(5.08,2.54) 7(7.62,0) 8(7.62,2.54) 9(10.16,0) 10(10.16,2.54) 11(12.7,0) 12(12.7,2.54) 13(15.24,0) 14(15.24,2.54) 15(17.78,0) 16(17.78,2.54) 17(20.32,0) 18(20.32,2.54) 19(22.86,0) 20(22.86,2.54) 21(25.4,0) 22(25.4,2.54) 23(27.94,0) 24(27.94,2.54) 25(30.48,0) 26(30.48,2.54) 27(33.02,0) 28(33.02,2.54) 29(35.56,0) 30(35.56,2.54) 31(38.1,0) 32(38.1,2.54) 33(40.64,0) 34(40.64,2.54) 35(43.18,0) 36(43.18,2.54) 37(45.72,0) 38(45.72,2.54) 39(48.26,0) 40(48.26,2.54) 41(50.8,0) 42(50.8,2.54) 43(53.34,0) 44(53.34,2.54) 45(55.88,0) 46(55.88,2.54)
L2P_4_2X4_4X1_8MM
  rrect 1.5x2.25 smd: 1(-1.85,-0.05) 2(1.85,-0.05)
L0402
  rect 0.508x0.559 smd: 1(-0.483,0) 2(0.483,0)
L0805
  rrect 1.016x1.397 smd: 1(-0.889,0) 2(0.889,0)
L1008
  rect 1.143x1.905 smd: 1(-1.143,0) 2(1.143,0)
L4242
  rrect 1.55x3.1 smd: 1(-1.75,0) 2(1.75,0)
LED0402
  rect 0.635x0.508 smd: 1(-0.508,0) 2(0.508,0)
M5S250_SOC_FCV484
  round 0.4 smd: A1(-8.4,8.4) A2(-7.6,8.4) A3(-6.8,8.4) A4(-6,8.4) A5(-5.2,8.4) A6(-4.4,8.4) A7(-3.6,8.4) A8(-2.8,8.4) A9(-2,8.4) A10(-1.2,8.4) A11(-0.4,8.4) A12(0.4,8.4) A13(1.2,8.4) A14(2,8.4) A15(2.8,8.4) A16(3.6,8.4) A17(4.4,8.4) A18(5.2,8.4) A19(6,8.4) A20(6.8,8.4) A21(7.6,8.4) A22(8.4,8.4) AA1(-8.4,-7.6) AA2(-7.6,-7.6) AA3(-6.8,-7.6) AA4(-6,-7.6) AA5(-5.2,-7.6) AA6(-4.4,-7.6) AA7(-3.6,-7.6) AA8(-2.8,-7.6) AA9(-2,-7.6) AA10(-1.2,-7.6) AA11(-0.4,-7.6) AA12(0.4,-7.6) AA13(1.2,-7.6) AA14(2,-7.6) AA15(2.8,-7.6) AA16(3.6,-7.6) AA17(4.4,-7.6) AA18(5.2,-7.6) AA19(6,-7.6) AA20(6.8,-7.6) AA21(7.6,-7.6) AA22(8.4,-7.6) AB1(-8.4,-8.4) AB2(-7.6,-8.4) AB3(-6.8,-8.4) AB4(-6,-8.4) AB5(-5.2,-8.4) AB6(-4.4,-8.4) AB7(-3.6,-8.4) AB8(-2.8,-8.4) AB9(-2,-8.4) AB10(-1.2,-8.4) AB11(-0.4,-8.4) AB12(0.4,-8.4) AB13(1.2,-8.4) AB14(2,-8.4) AB15(2.8,-8.4) AB16(3.6,-8.4) AB17(4.4,-8.4) AB18(5.2,-8.4) AB19(6,-8.4) AB20(6.8,-8.4) AB21(7.6,-8.4) AB22(8.4,-8.4) B1(-8.4,7.6) B2(-7.6,7.6) B3(-6.8,7.6) B4(-6,7.6) B5(-5.2,7.6) B6(-4.4,7.6) B7(-3.6,7.6) B8(-2.8,7.6) B9(-2,7.6) B10(-1.2,7.6) B11(-0.4,7.6) B12(0.4,7.6) B13(1.2,7.6) B14(2,7.6) B15(2.8,7.6) B16(3.6,7.6) B17(4.4,7.6) B18(5.2,7.6) B19(6,7.6) B20(6.8,7.6) B21(7.6,7.6) B22(8.4,7.6) C1(-8.4,6.8) C2(-7.6,6.8) C3(-6.8,6.8) C4(-6,6.8) C5(-5.2,6.8) C6(-4.4,6.8) C7(-3.6,6.8) C8(-2.8,6.8) C9(-2,6.8) C10(-1.2,6.8) C11(-0.4,6.8) C12(0.4,6.8) C13(1.2,6.8) C14(2,6.8) C15(2.8,6.8) C16(3.6,6.8) C17(4.4,6.8) C18(5.2,6.8) C19(6,6.8) C20(6.8,6.8) C21(7.6,6.8) C22(8.4,6.8) D1(-8.4,6) D2(-7.6,6) D3(-6.8,6) D4(-6,6) D5(-5.2,6) D6(-4.4,6) D7(-3.6,6) D8(-2.8,6) D9(-2,6) D10(-1.2,6) D11(-0.4,6) D12(0.4,6) D13(1.2,6) D14(2,6) D15(2.8,6) D16(3.6,6) D17(4.4,6) D18(5.2,6) D19(6,6) D20(6.8,6) D21(7.6,6) D22(8.4,6) E1(-8.4,5.2) E2(-7.6,5.2) E3(-6.8,5.2) E4(-6,5.2) E5(-5.2,5.2) E6(-4.4,5.2) E7(-3.6,5.2) E8(-2.8,5.2) E9(-2,5.2) E10(-1.2,5.2) E11(-0.4,5.2) E12(0.4,5.2) E13(1.2,5.2) E14(2,5.2) E15(2.8,5.2) E16(3.6,5.2) E17(4.4,5.2) E18(5.2,5.2) E19(6,5.2) E20(6.8,5.2) E21(7.6,5.2) E22(8.4,5.2) F1(-8.4,4.4) F2(-7.6,4.4) F3(-6.8,4.4) F4(-6,4.4) F5(-5.2,4.4) F6(-4.4,4.4) F7(-3.6,4.4) F8(-2.8,4.4) F9(-2,4.4) F10(-1.2,4.4) F11(-0.4,4.4) F12(0.4,4.4) F13(1.2,4.4) F14(2,4.4) F15(2.8,4.4) F16(3.6,4.4) F17(4.4,4.4) F18(5.2,4.4) F19(6,4.4) F20(6.8,4.4) F21(7.6,4.4) F22(8.4,4.4) G1(-8.4,3.6) G2(-7.6,3.6) G3(-6.8,3.6) G4(-6,3.6) G5(-5.2,3.6) G6(-4.4,3.6) G7(-3.6,3.6) G8(-2.8,3.6) G9(-2,3.6) G10(-1.2,3.6) G11(-0.4,3.6) G12(0.4,3.6) G13(1.2,3.6) G14(2,3.6) G15(2.8,3.6) G16(3.6,3.6) G17(4.4,3.6) G18(5.2,3.6) G19(6,3.6) G20(6.8,3.6) G21(7.6,3.6) G22(8.4,3.6) H1(-8.4,2.8) H2(-7.6,2.8) H3(-6.8,2.8) H4(-6,2.8) H5(-5.2,2.8) H6(-4.4,2.8) H7(-3.6,2.8) H8(-2.8,2.8) H9(-2,2.8) H10(-1.2,2.8) H11(-0.4,2.8) H12(0.4,2.8) H13(1.2,2.8) H14(2,2.8) H15(2.8,2.8) H16(3.6,2.8) H17(4.4,2.8) H18(5.2,2.8) H19(6,2.8) H20(6.8,2.8) H21(7.6,2.8) H22(8.4,2.8) J1(-8.4,2) J2(-7.6,2) J3(-6.8,2) J4(-6,2) J5(-5.2,2) J6(-4.4,2) J7(-3.6,2) J8(-2.8,2) J9(-2,2) J10(-1.2,2) J11(-0.4,2) J12(0.4,2) J13(1.2,2) J14(2,2) J15(2.8,2) J16(3.6,2) J17(4.4,2) J18(5.2,2) J19(6,2) J20(6.8,2) J21(7.6,2) J22(8.4,2) K1(-8.4,1.2) K2(-7.6,1.2) K3(-6.8,1.2) K4(-6,1.2) K5(-5.2,1.2) K6(-4.4,1.2) K7(-3.6,1.2) K8(-2.8,1.2) K9(-2,1.2) K10(-1.2,1.2) K11(-0.4,1.2) K12(0.4,1.2) K13(1.2,1.2) K14(2,1.2) K15(2.8,1.2) K16(3.6,1.2) K17(4.4,1.2) K18(5.2,1.2) K19(6,1.2) K20(6.8,1.2) K21(7.6,1.2) K22(8.4,1.2) L1(-8.4,0.4) L2(-7.6,0.4) L3(-6.8,0.4) L4(-6,0.4) L5(-5.2,0.4) L6(-4.4,0.4) L7(-3.6,0.4) L8(-2.8,0.4) L9(-2,0.4) L10(-1.2,0.4) L11(-0.4,0.4) L12(0.4,0.4) L13(1.2,0.4) L14(2,0.4) L15(2.8,0.4) L16(3.6,0.4) L17(4.4,0.4) L18(5.2,0.4) L19(6,0.4) L20(6.8,0.4) L21(7.6,0.4) L22(8.4,0.4) M1(-8.4,-0.4) M2(-7.6,-0.4) M3(-6.8,-0.4) M4(-6,-0.4) M5(-5.2,-0.4) M6(-4.4,-0.4) M7(-3.6,-0.4) M8(-2.8,-0.4) M9(-2,-0.4) M10(-1.2,-0.4) M11(-0.4,-0.4) M12(0.4,-0.4) M13(1.2,-0.4) M14(2,-0.4) M15(2.8,-0.4) M16(3.6,-0.4) M17(4.4,-0.4) M18(5.2,-0.4) M19(6,-0.4) M20(6.8,-0.4) M21(7.6,-0.4) M22(8.4,-0.4) N1(-8.4,-1.2) N2(-7.6,-1.2) N3(-6.8,-1.2) N4(-6,-1.2) N5(-5.2,-1.2) N6(-4.4,-1.2) N7(-3.6,-1.2) N8(-2.8,-1.2) N9(-2,-1.2) N10(-1.2,-1.2) N11(-0.4,-1.2) N12(0.4,-1.2) N13(1.2,-1.2) N14(2,-1.2) N15(2.8,-1.2) N16(3.6,-1.2) N17(4.4,-1.2) N18(5.2,-1.2) N19(6,-1.2) N20(6.8,-1.2) N21(7.6,-1.2) N22(8.4,-1.2) P1(-8.4,-2) P2(-7.6,-2) P3(-6.8,-2) P4(-6,-2) P5(-5.2,-2) P6(-4.4,-2) P7(-3.6,-2) P8(-2.8,-2) P9(-2,-2) P10(-1.2,-2) P11(-0.4,-2) P12(0.4,-2) P13(1.2,-2) P14(2,-2) P15(2.8,-2) P16(3.6,-2) P17(4.4,-2) P18(5.2,-2) P19(6,-2) P20(6.8,-2) P21(7.6,-2) P22(8.4,-2) R1(-8.4,-2.8) R2(-7.6,-2.8) R3(-6.8,-2.8) R4(-6,-2.8) R5(-5.2,-2.8) R6(-4.4,-2.8) R7(-3.6,-2.8) R8(-2.8,-2.8) R9(-2,-2.8) R10(-1.2,-2.8) R11(-0.4,-2.8) R12(0.4,-2.8) R13(1.2,-2.8) R14(2,-2.8) R15(2.8,-2.8) R16(3.6,-2.8) R17(4.4,-2.8) R18(5.2,-2.8) R19(6,-2.8) R20(6.8,-2.8) R21(7.6,-2.8) R22(8.4,-2.8) T1(-8.4,-3.6) T2(-7.6,-3.6) T3(-6.8,-3.6) T4(-6,-3.6) T5(-5.2,-3.6) T6(-4.4,-3.6) T7(-3.6,-3.6) T8(-2.8,-3.6) T9(-2,-3.6) T10(-1.2,-3.6) T11(-0.4,-3.6) T12(0.4,-3.6) T13(1.2,-3.6) T14(2,-3.6) T15(2.8,-3.6) T16(3.6,-3.6) T17(4.4,-3.6) T18(5.2,-3.6) T19(6,-3.6) T20(6.8,-3.6) T21(7.6,-3.6) T22(8.4,-3.6) U1(-8.4,-4.4) U2(-7.6,-4.4) U3(-6.8,-4.4) U4(-6,-4.4) U5(-5.2,-4.4) U6(-4.4,-4.4) U7(-3.6,-4.4) U8(-2.8,-4.4) U9(-2,-4.4) U10(-1.2,-4.4) U11(-0.4,-4.4) U12(0.4,-4.4) U13(1.2,-4.4) U14(2,-4.4) U15(2.8,-4.4) U16(3.6,-4.4) U17(4.4,-4.4) U18(5.2,-4.4) U19(6,-4.4) U20(6.8,-4.4) U21(7.6,-4.4) U22(8.4,-4.4) V1(-8.4,-5.2) V2(-7.6,-5.2) V3(-6.8,-5.2) V4(-6,-5.2) V5(-5.2,-5.2) V6(-4.4,-5.2) V7(-3.6,-5.2) V8(-2.8,-5.2) V9(-2,-5.2) V10(-1.2,-5.2) V11(-0.4,-5.2) V12(0.4,-5.2) V13(1.2,-5.2) V14(2,-5.2) V15(2.8,-5.2) V16(3.6,-5.2) V17(4.4,-5.2) V18(5.2,-5.2) V19(6,-5.2) V20(6.8,-5.2) V21(7.6,-5.2) V22(8.4,-5.2) W1(-8.4,-6) W2(-7.6,-6) W3(-6.8,-6) W4(-6,-6) W5(-5.2,-6) W6(-4.4,-6) W7(-3.6,-6) W8(-2.8,-6) W9(-2,-6) W10(-1.2,-6) W11(-0.4,-6) W12(0.4,-6) W13(1.2,-6) W14(2,-6) W15(2.8,-6) W16(3.6,-6) W17(4.4,-6) W18(5.2,-6) W19(6,-6) W20(6.8,-6) W21(7.6,-6) W22(8.4,-6) Y1(-8.4,-6.8) Y2(-7.6,-6.8) Y3(-6.8,-6.8) Y4(-6,-6.8) Y5(-5.2,-6.8) Y6(-4.4,-6.8) Y7(-3.6,-6.8) Y8(-2.8,-6.8) Y9(-2,-6.8) Y10(-1.2,-6.8) Y11(-0.4,-6.8) Y12(0.4,-6.8) Y13(1.2,-6.8) Y14(2,-6.8) Y15(2.8,-6.8) Y16(3.6,-6.8) Y17(4.4,-6.8) Y18(5.2,-6.8) Y19(6,-6.8) Y20(6.8,-6.8) Y21(7.6,-6.8) Y22(8.4,-6.8)
